# Altium PCB ECG_PCB.PcbDoc
Units mil, origin at the board's own origin, x right, y up, seen from the top; angles counter-clockwise.
Board outline 1724.99 x 1811.5 mil, 4 copper layers (Top Layer, GND, Layer 2, Bottom Layer), stack 23.756 mil thick; 69 components, 50 nets, 267 pads, 156 vias.
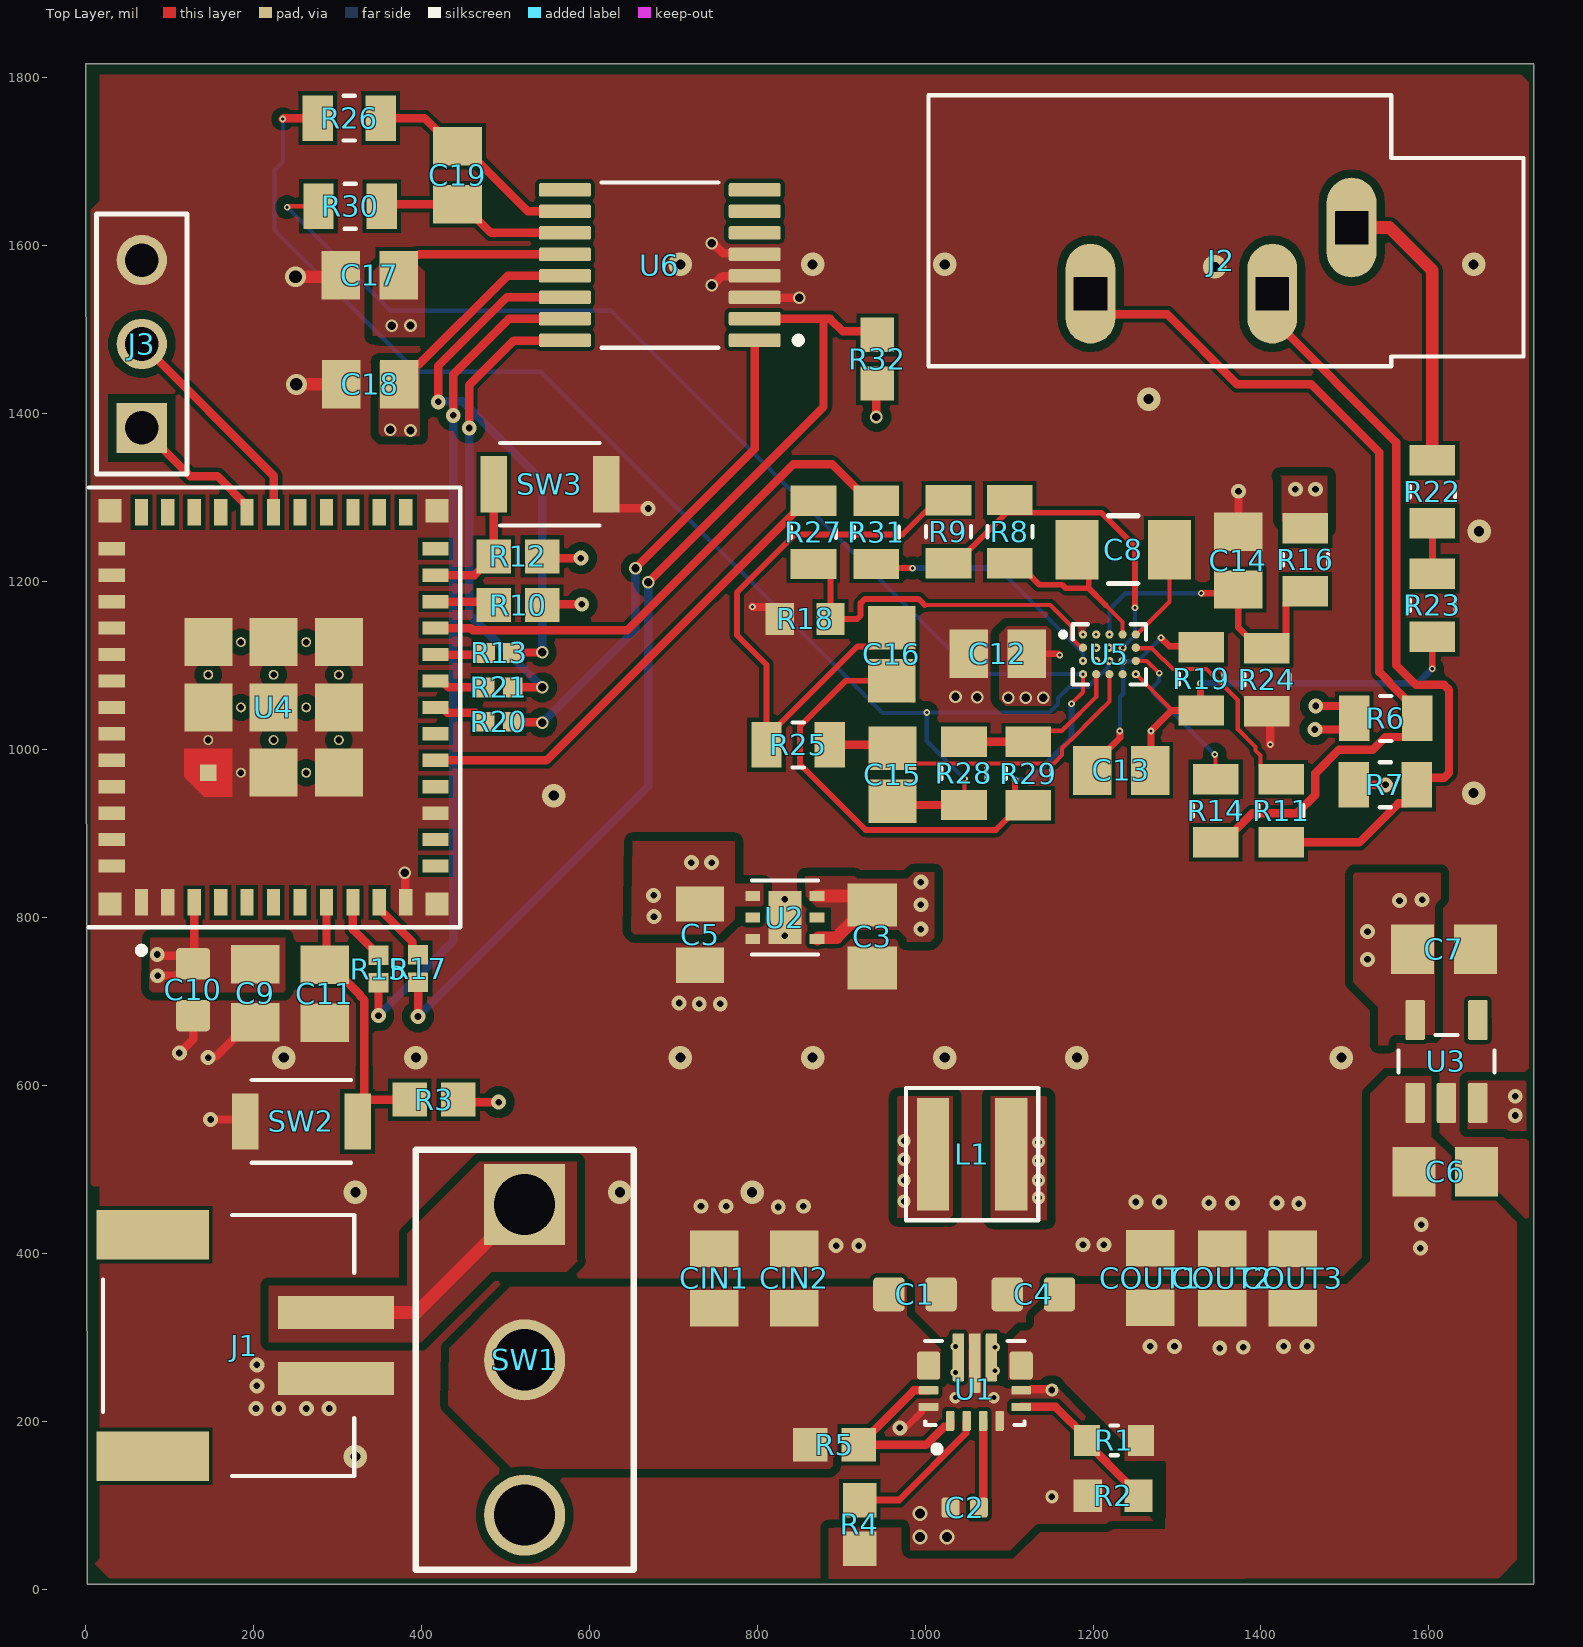
[diagram p0: Top Layer view]
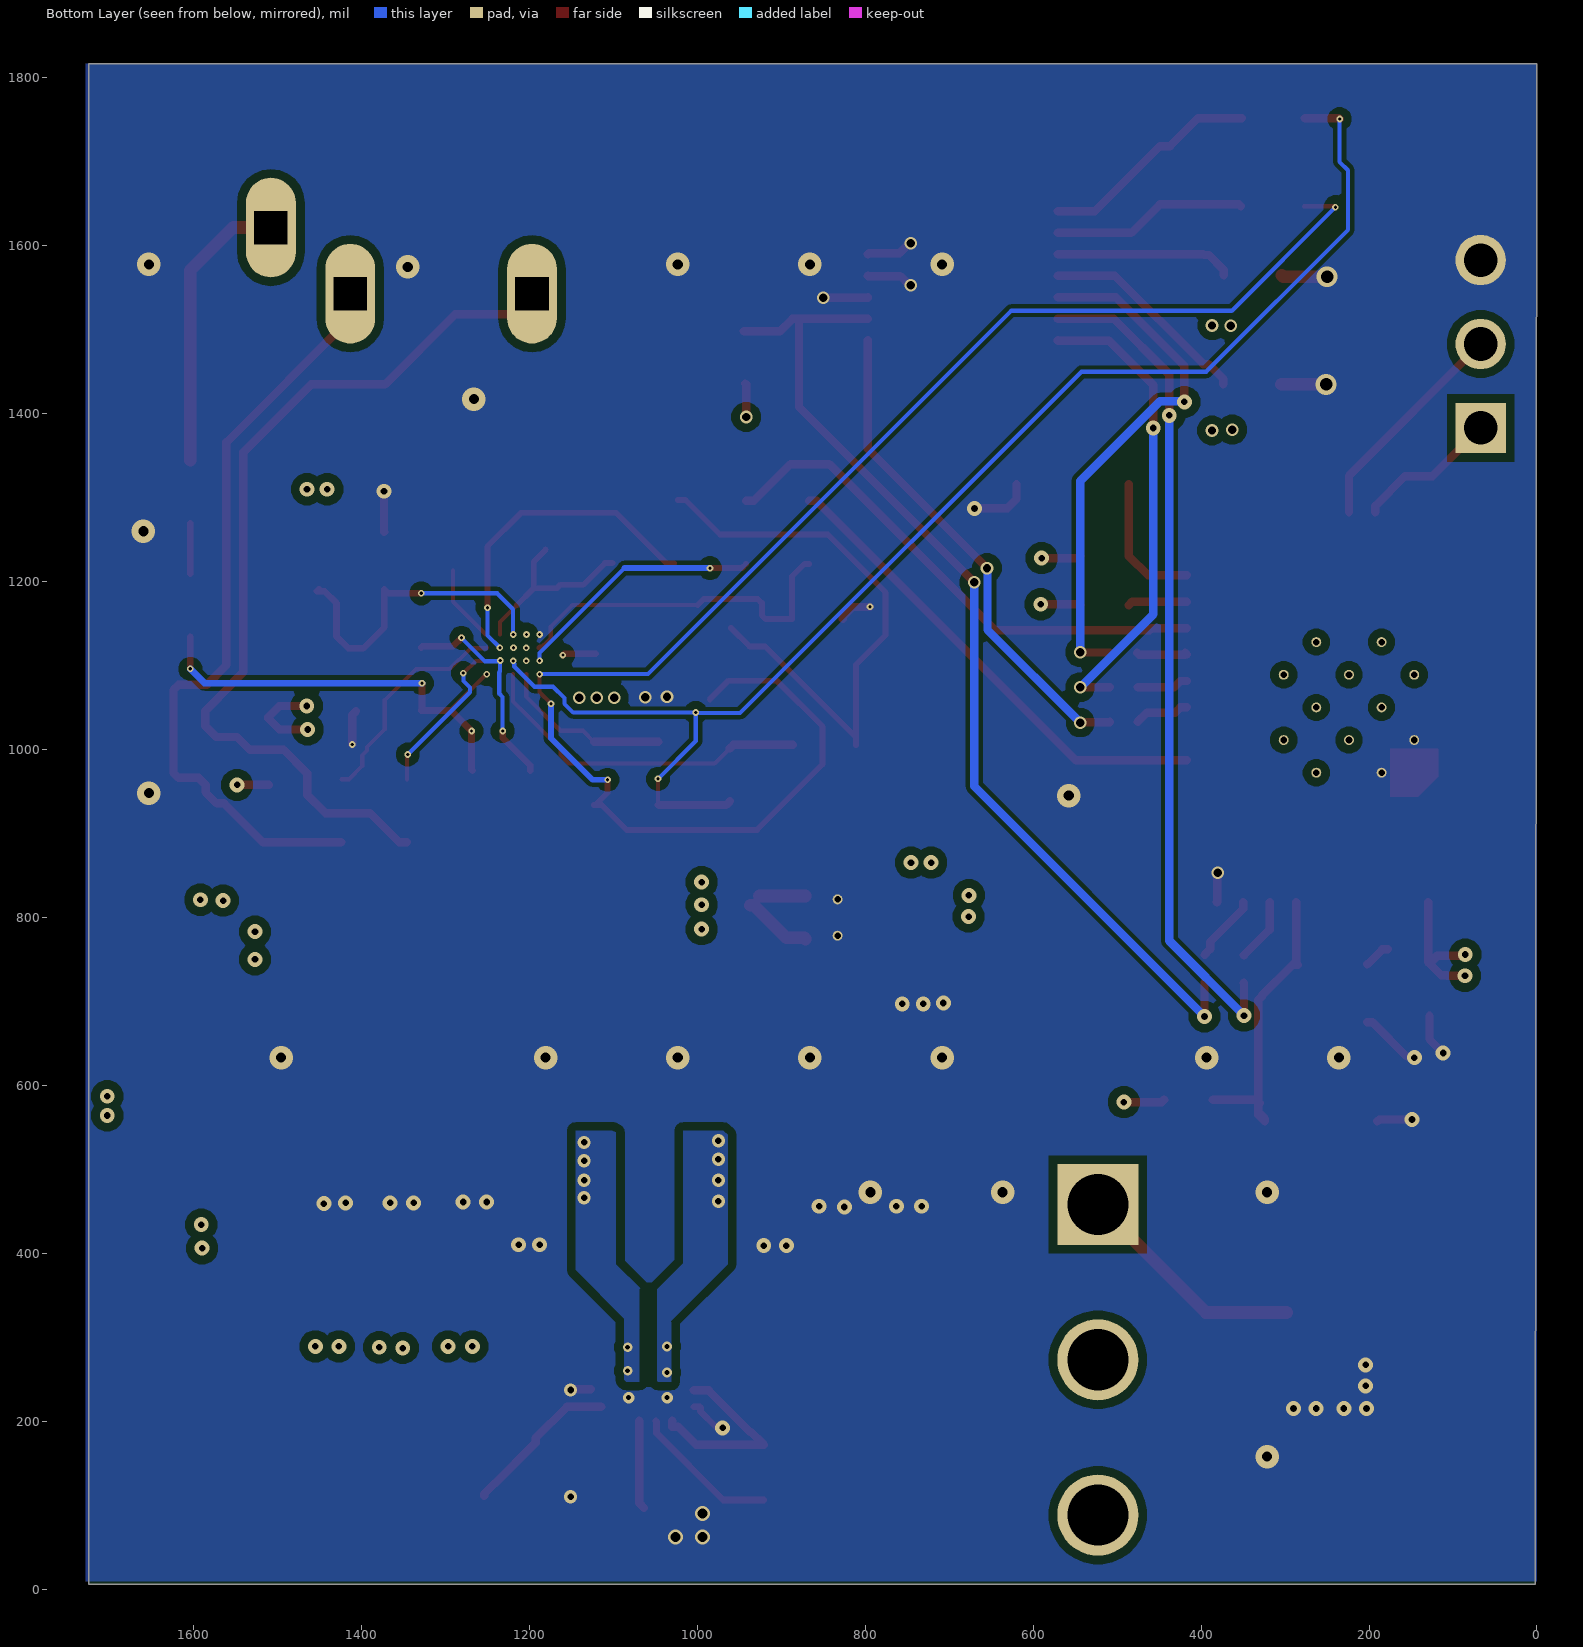
[diagram p1: Bottom Layer view, seen from below]
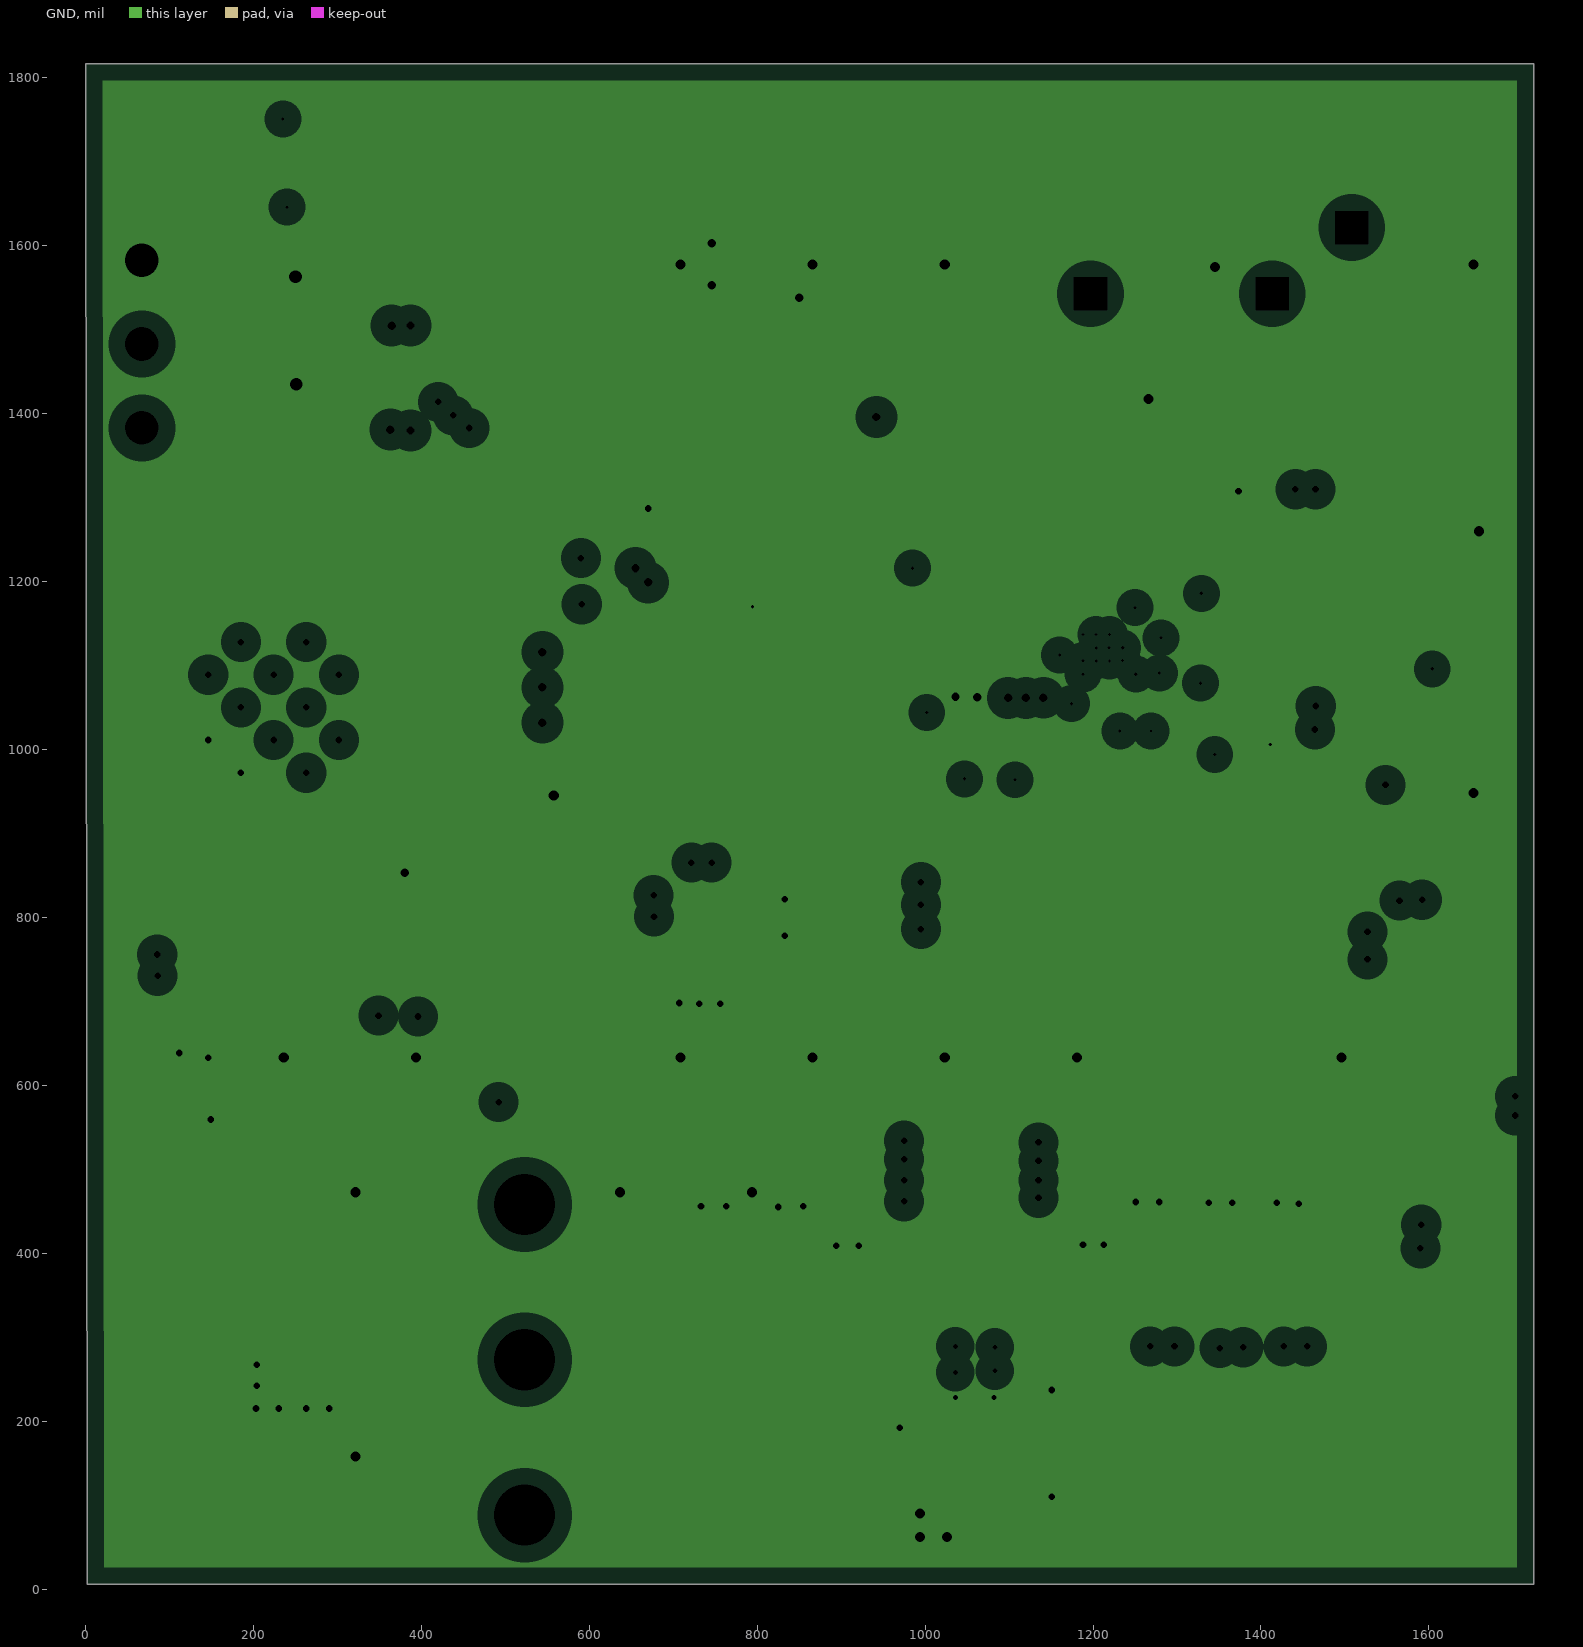
[diagram p2: GND, clearances drawn from the general rule]
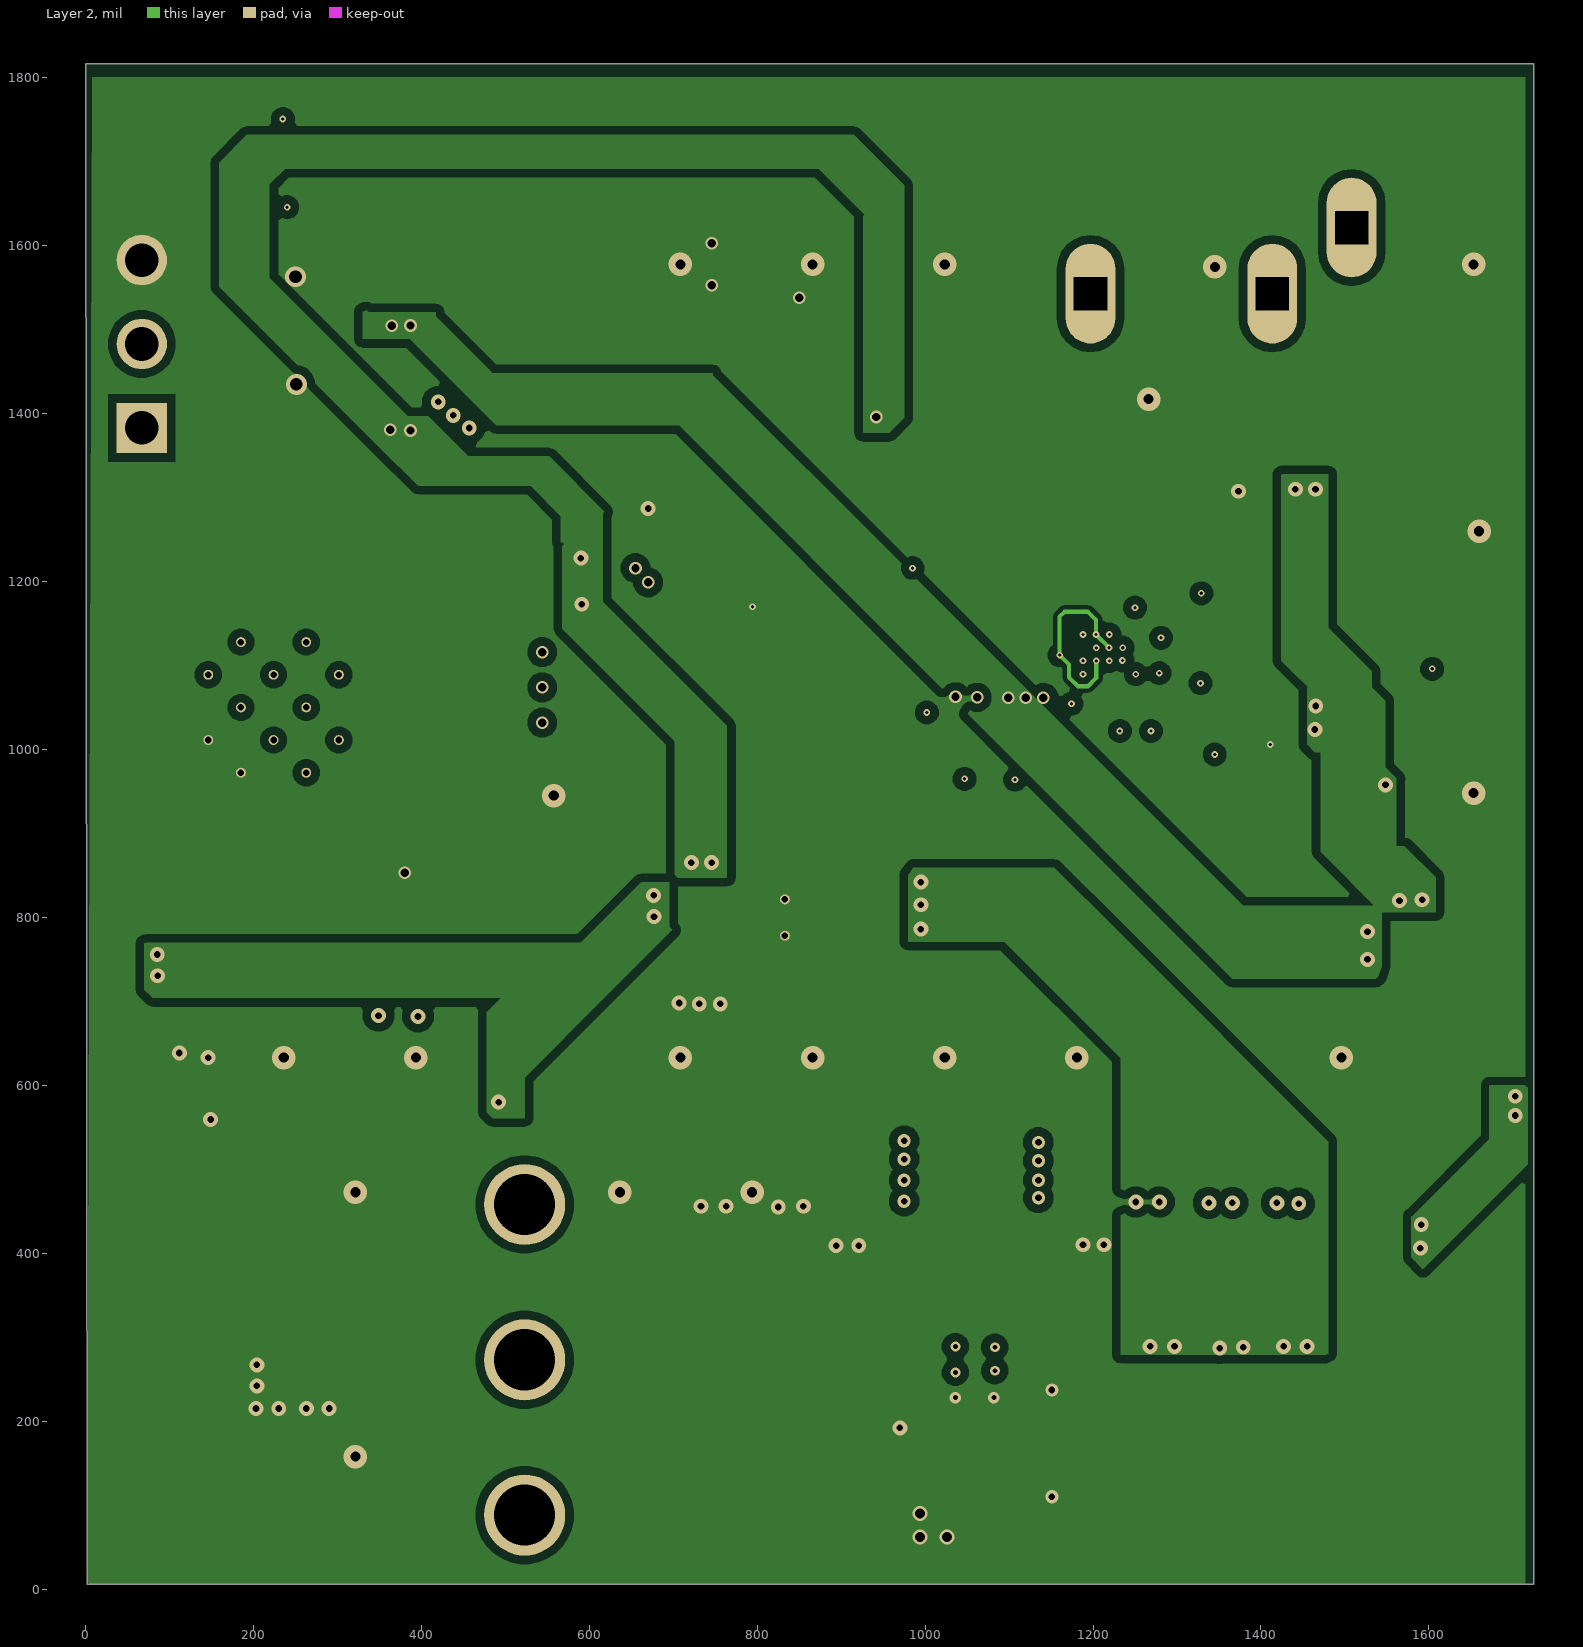
[diagram p3: Layer 2]
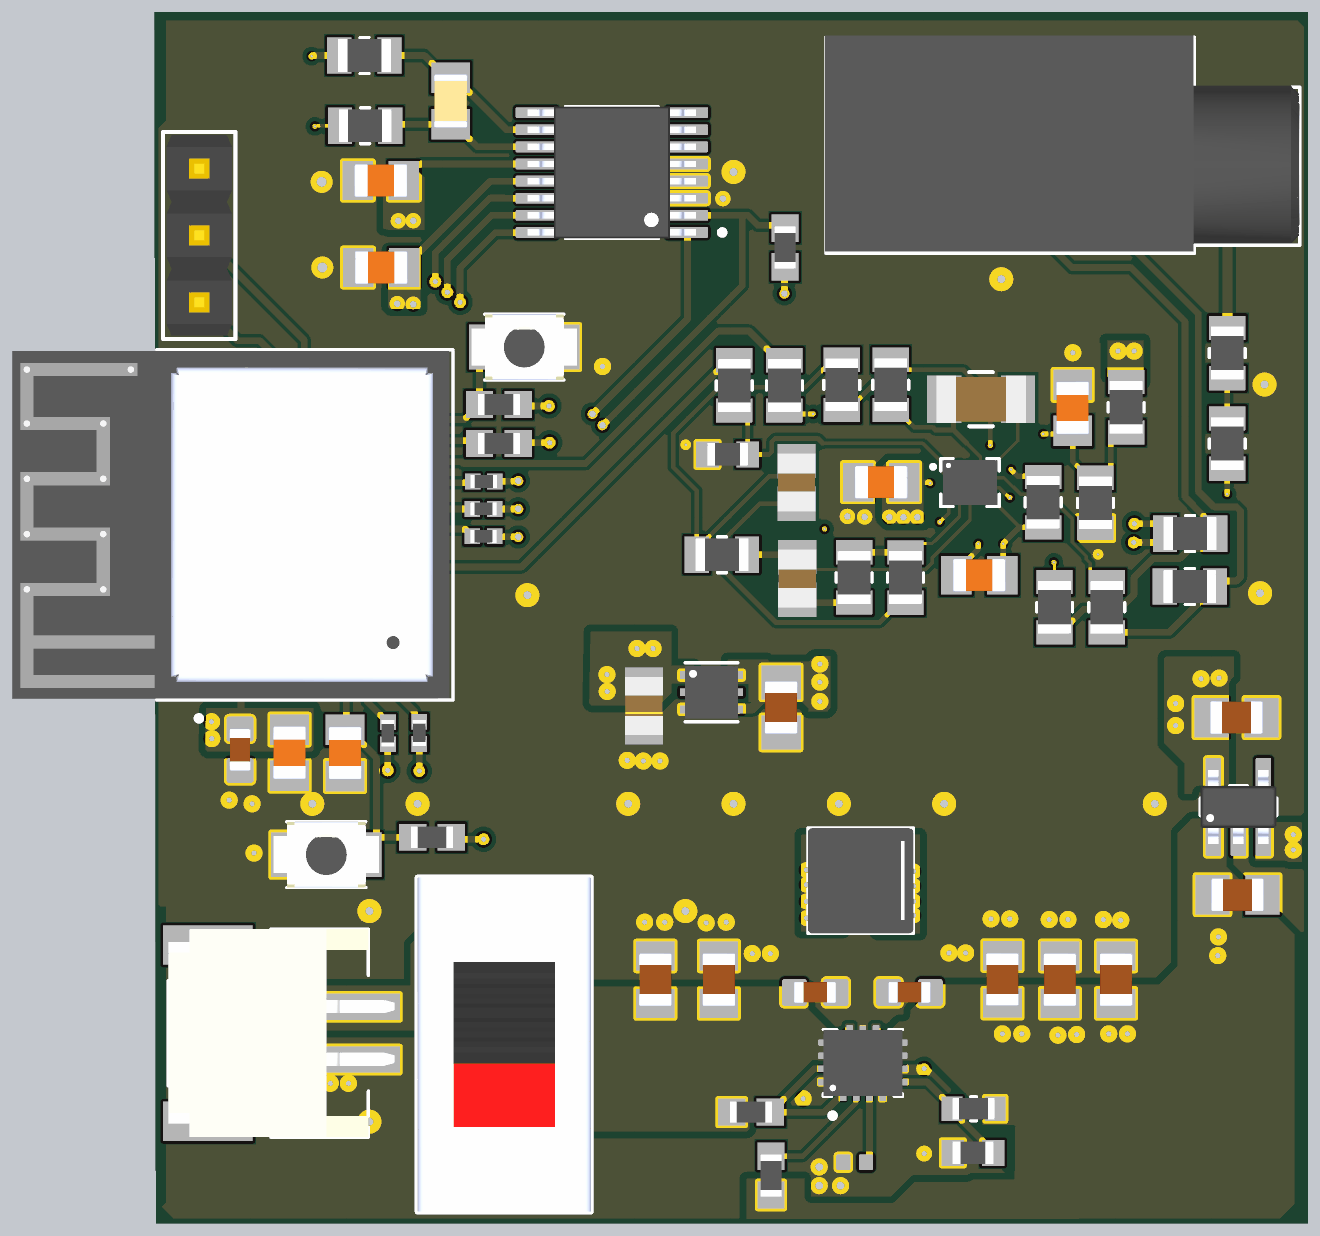
[diagram p4: 3D render of the assembled board from above, using the file's embedded part models]

## Layer stack, top to bottom
Top Solder: solder mask 0.4, Solder Resist, Dk 3.5
Top Layer: signal copper 1.4
Dielectric 2: prepreg 2.8, PP-006, Dk 4.1
GND: plane copper 1.378, net GND
Dielectric 1: dielectric 12.6, FR-4, Dk 4.8
Layer 2: signal copper 1.378
Dielectric 3: prepreg 2.8, PP-006, Dk 4.1
Bottom Layer: signal copper 1.4
Bottom Solder: solder mask 0.4, Solder Resist, Dk 3.5

## Board outline
2,5.5 1725,5.5 1725,1817 0.01,1817

## Design rules (kind name [scope] priority, off if disabled: settings)
Clearance [All] p1: gap=5 ignorepadtopadclearanceinfootprint=TRUE except(3: Arc-Via Track-Via; 10: THPad-THPad THPad-Via THPad-Fill THPad-Poly THPad-Region Via-Fill Via-Poly Via-Region Fill-Fill Fill-Poly Fill-Region Poly-Poly Poly-Region Region-Region)
HoleToHoleClearance [All] p1: gap=8 allowstackedmicrovias=TRUE
MinimumSolderMaskSliver [All] p1: minsoldermaskwidth=1
PlaneClearance [All] p1: clearance=20
PlaneConnect [All] p1: planeconnectstyle=Direct reliefexpansion=20 reliefentries=4 reliefconductorwidth=10 reliefairgap=10
PolygonConnect [All] p1: connectstyle=Direct reliefconductorwidth=10 reliefentries=4 polygonreliefangle="90 Angle" airgapwidth=10
RoutingVias [All] p1: holewidth=28 width=50 viastyle="Through Hole" minholewidth=3.94 minwidth=5.91 maxholewidth=28 maxwidth=50
SilkToSolderMaskClearance [IsPad] p1: minsilkscreentomaskgap=4 clearancetoexposedcopper=TRUE
SolderMaskExpansion [All] p1: expansion=4 istentingtop=FALSE
SupplyNets "Schematic Supply Nets" [InNet('GND')] p1: voltage=0.000
Width [All] p1: maxlimit=50 minlimit=4 preferedwidth=10 toplayer_minwidth=5 bottomlayer_minwidth=5 minimp=50.000000 maximp=50.000000 favimp=50.000000
25 further rules are at their usual default settings.

## Classes and differential pairs
component class ECG_Signal: C8 C9 C10 C11 C12 C13 C14 C15 C16 C17 C18 C19 J2 J3 R3 R6 R7 R8 R9 R10 R11 R12 R13 R14 R15 R16 R17 R18 R19 R20 R21 R22 R23 R24 R25 R26 R27 R28 R29 R30 R31 R32 SW2 SW3 U4 U5 U6
component class ECG_PCB_Power: C1 C2 C3 C4 C5 C6 C7 CIN1 CIN2 COUT1 COUT2 COUT3 J1 L1 R1 R2 R4 R5 SW1 U1 U2 U3

## Components (designator, comment, footprint, x,y, rotation, side; value= is the part's Value field where it differs from the comment)
C1 "10uF 0603" CAPC1608X100N 987.9,351 r180 top
C2 "0.1uF 0402" CAPC1005X55N 1047.07,97 r0 top
C3 "10uF 16V" CAPC2012X135N 937,777.1 r90 top
C4 "10uF 0603" CAPC1608X100N 1129,351 r0 top
C5 "22UF 10V X5R" CAP_GRM21B_MUR 732,779.5 r90 top
C6 "4.7uF" CAPC2012X135N 1619.6,497 r0 top
C7 "4.7uF" CAPC2012X135N 1618,762 r0 top
C8 "3.3uF 1206" CAPC340180_180N_KEM 1236,1238 r180 top
C9 "100nF 0805" CAPC2012X88N 202,709.55 r90 top
C10 "10uF 0603" CAPC1608X100N 128,713.9 r270 top
C11 "1 uF 0805" CAPC2012X88N 285,709 r270 top
C12 "100nF 0805" CAPC2012X88N 1086.55,1114 r180 top
C13 "1nF 0805" CAPC2012X88N 1233.55,975 r180 top
C14 "100nF 0805" CAPC2012X88N 1373,1225 r90 top
C15 "5.6 nF" CAPC220145_88N_KEM 961.25,969.87 r90 top
C16 "5.6 nF" CAPC220145_88N_KEM 960.25,1113.48 r270 top
C17 "100nF 0805" CAPC2012X88N 338.55,1565.1 r0 top
C18 "100nF 0805" CAPC2012X88N 339,1435 r0 top
C19 "10 nF 0805" CAPC2012X140N 443,1684 r270 top
CIN1 "10uF 0805" CAPC2012X145N 749,370 r270 top
CIN2 "10uF 0805" CAPC2012X145N 844,370 r270 top
COUT1 "22uF 0805" CAPC2012X145N 1268,370.43 r270 top
COUT2 "22uF 0805" CAPC2012X145N 1354,370 r270 top
COUT3 "22uF 0805" CAPC2012X145N 1438,370 r270 top
J1 "BAT" JST_S2B-PH-SM4-TB 190,290 r270 top
J2 "SJ1-3533NG" CUI_SJ1-3533NG 1508.02,1621.74 r180 top
J3 "UART" CONN_PH1-03-UA_ADM 67,1383 r90 top
L1 "1.5 uH" IND_XFL4020-152MEC 1056,518 r180 top
R1 "390kohm 0603" RESC1608X55N 1225,177 r0 top
R2 "100 kohm 0603" RESC1508X50N 1224,111 r0 top
R3 "10k 0603" RESC1607X60N 415,583 r180 top
R4 "100 kOhms 0603 A" RESC1607X60N 922,77 r90 top
R5 "10k 0603" RESC1607X60N 892.06,172 r0 top
R6 "10M" RESC2012X60N 1548.63,1037 r180 top
R7 "10M" RESC2012X60N 1548.23,958 r180 top
R8 "10M" RESC2012X60N 1101,1259.6 r90 top
R9 "499k" RESC2012X60N 1027.78,1259.48 r90 top
R10 "10k 0603" RESC1607X60N 515.06,1172 r0 top
R11 "180k" RESC2012X60N 1424,927 r90 top
R12 "10k 0603" RESC1607X60N 515,1230 r0 top
R13 "47ohm" RESC1005X35N 492.46,1115 r0 top
R14 "180k" RESC2012X60N 1346,927 r90 top
R15 "47ohm" RESC1005X35N 349,738.46 r90 top
R16 "10M" RESC2012X60N 1453,1226 r90 top
R17 "47ohm" RESC1005X35N 396,739 r90 top
R18 "100 kohm 0603" RESC1508X50N 857.13,1155.48 r0 top
R19 "10M" RESC2012X60N 1329,1084 r90 top
R20 "47ohm" RESC1005X35N 492,1033 r180 top
R21 "47ohm" RESC1005X35N 492,1074 r180 top
R22 "180k" RESC2012X60N 1604.25,1307.08 r270 top
R23 "180k" RESC2012X60N 1604.25,1171.68 r270 top
R24 "10M" RESC2012X60N 1407,1083 r90 top
R25 "1M" RESC2012X60N 848.65,1005.48 r0 top
R26 "1k" RESC2012X60N 314,1752 r180 top
R27 "1k" RESC2012X60N 867,1258.6 r90 top
R28 "1M" RESC2012X60N 1046.25,971.48 r270 top
R29 "1M" RESC2012X60N 1123,971.4 r90 top
R30 "1k" RESC2012X60N 315,1647 r0 top
R31 "1k" RESC2012X60N 942,1258.6 r90 top
R32 "10k 0603" RESC1607X60N 943,1464.94 r90 top
SW1 "Slide switch" SW_1101M2S3CQE2 523,273.04 r0 top
SW2 "Button" SW_B3U-1000P 257,557 r0 top
SW3 "Button" SW_B3U-1000P 553,1316 r0 top
U1 "Buck-Boost" VREG_TPS63070RNMR 1059.32,245.49 r90 top locked
U2 "Digital LDO" VREG_TLV75733PDRVR 833,799.85 r0 top
U3 "Analog LDO" SOT95P280X145-5N 1621,628.41 r90 top
U4 "MCU" MODULE_ESP32-H2-MINI-1-H2 117.6,1050.12 r90 top
U5 "AD8233ACBZ-R7" BGA20N40P5X4_204X170X56N 1219.5,1113.38 r0 top locked
U6 "ADC" SOP65P640X120-16N 684,1577 r180 top

## Footprints (in the part's own frame and the unit in brackets; to place one, negate y for a bottom-side part, rotate by r counter-clockwise, add the part's x,y. Pads: shape width x height; smd on the part's side, far side on the other; paste and mask are expansions set on the pad)
BGA20N40P5X4_204X170X56N [mm]
  round 0.25 smd mask+0.102: A1(-0.8,0.6) A2(-0.4,0.6) A3(0,0.6) A4(0.4,0.6) A5(0.8,0.6) B1(-0.8,0.2) B2(-0.4,0.2) B3(0,0.2) B4(0.4,0.2) B5(0.8,0.2) C1(-0.8,-0.2) C2(-0.4,-0.2) C3(0,-0.2) C4(0.4,-0.2) C5(0.8,-0.2) D1(-0.8,-0.6) D2(-0.4,-0.6) D3(0,-0.6) D4(0.4,-0.6) D5(0.8,-0.6)
  silkscreen extent -1.45,-0.91 1.11,0.91, body extent -1.02,-0.85 1.02,0.85, height 0.56
CAP_GRM21B_MUR [mil]
  rect 42x57 smd paste+0 mask+0: 1(-36.5,0) 2(36.5,0)
  body extent -44,-29 44,29, height 57
CAPC1005X55N [mm]
  rrect25% 0.54x0.6 smd paste+0 mask+0.102: 1(-0.43,0) 2(0.43,0)
CAPC1608X100N [mm]
  rrect25% 0.95x1.03 smd paste+0 mask+0.102: 1(-0.79,0) 2(0.79,0)
  body extent -0.8,-0.4 0.8,0.4, height 1
CAPC2012X88N [mm]
  rect 1.16x1.47 smd: 1(-0.875,0) 2(0.875,0)
  body extent -1,-0.63 1,0.63, height 0.88
CAPC2012X135N [mm]
  rect 1.3x1.5 smd mask+0.102: 1(-0.95,0)
  rect 1.3x1.5 smd: 2(0.95,0)
  body extent -1,-0.63 1,0.63, height 1.4
CAPC2012X140N [mm]
  rect 1.16x1.47 smd: 1(-0.88,0) 2(0.88,0)
  body extent -1.02,-0.64 1.02,0.64, height 1.4
CAPC2012X145N [mm]
  rect 1.11x1.47 smd: 1(-0.9,0) 2(0.9,0)
  body extent -1,-0.63 1,0.63, height 1.45
CAPC220145_88N_KEM [mm]
  rect 1.306x1.45 smd paste+0 mask+0: 1(-0.803,0) 2(0.803,0)
  body extent -1.1,-0.72 1.1,0.72, height 0.88
CAPC340180_180N_KEM [mm]
  rect 1.306x1.8 smd paste+0 mask+0: 1(-1.403,0) 2(1.403,0)
  silkscreen extent -0.44,-1.03 0.44,1.03, body extent -1.7,-0.9 1.7,0.9, height 1.8
CONN_PH1-03-UA_ADM [mil]
  rect 60x60 hole 40 paste-99999 mask+0: 1(0,0)
  round 60 hole 40 paste-99999 mask+0: 2(100,0) 3(200,0)
  silkscreen extent -55,-54 255,54, body extent -50,-49 250,49, height 335
CUI_SJ1-3533NG [mm]
  oval 1.508x3.016 hole 1 square: 1(0,0) 2(2.4,2) 3(7.9,2)
  silkscreen extent -5.2,-4 12.8,4.2, body extent -5.22,-4.06 12.84,4.14, height 11.9
IND_XFL4020-152MEC [mm]
  rect 0.98x3.4 smd: 1(-1.185,0) 2(1.185,0)
  silkscreen extent -2,-2 2,2, body extent -2,-2 2,2, height 2.1
JST_S2B-PH-SM4-TB [mm]
  rect 1x3.5 smd paste+0 mask+0.102: 1(-1,2.75) 2(1,2.75)
  rect 1.5x3.4 smd paste+0 mask+0.102: T1(-3.35,-2.8) T2(3.35,-2.8)
  silkscreen extent -3.95,-4.3 3.95,3.3, body extent -3.96,-4.3 3.94,4.3, height 5.5
MODULE_ESP32-H2-MINI-1-H2 [mm]
  rect 0.8x0.4 smd: 1(-5.9,1.3) 2(-5.9,0.5) 3(-5.9,-0.3) 4(-5.9,-1.1) 5(-5.9,-1.9) 6(-5.9,-2.7) 7(-5.9,-3.5) 8(-5.9,-4.3) 9(-5.9,-5.1) 10(-5.9,-5.9) 11(-5.9,-6.7) 25(5.9,-6.7) 26(5.9,-5.9) 27(5.9,-5.1) 28(5.9,-4.3) 29(5.9,-3.5) 30(5.9,-2.7) 31(5.9,-1.9) 32(5.9,-1.1) 33(5.9,-0.3) 34(5.9,0.5) 35(5.9,1.3)
  rect 0.4x0.8 smd: 12(-4.8,-7.6) 13(-4,-7.6) 14(-3.2,-7.6) 15(-2.4,-7.6) 16(-1.6,-7.6) 17(-0.8,-7.6) 18(0,-7.6) 19(0.8,-7.6) 20(1.6,-7.6) 21(2.4,-7.6) 22(3.2,-7.6) 23(4,-7.6) 24(4.8,-7.6) 36(4.8,2.2) 37(4,2.2) 38(3.2,2.2) 39(2.4,2.2) 40(1.6,2.2) 41(0.8,2.2) 42(0,2.2) 43(-0.8,2.2) 44(-1.6,2.2) 45(-2.4,2.2) 46(-3.2,2.2) 47(-4,2.2) 48(-4.8,2.2)
  rect 1.45x1.45 smd: 49_1(0,-2.7) 49_3(0,-0.725) 49_4(1.975,-0.725) 49_5(-1.975,-2.7) 49_6(1.975,-2.7) 49_7(-1.975,-4.675) 49_8(0,-4.675) 49_9(1.975,-4.675)
  rect 0.5x0.5 smd paste-1 mask+0: 49_2(-1.975,-0.725)
  rect 0.7x0.7 smd: 50(5.95,2.25) 51(5.95,-7.65) 52(-5.95,-7.65) 53(-5.95,2.25)
  round 0.3 hole 0.2 mask+0: 54(-0.988,-0.725) 55(0.988,-0.725) 56(-1.975,-1.713) 57(0,-1.713) 58(1.975,-1.713) 59(-0.988,-2.7) 60(0.988,-2.7) 61(-1.975,-3.688) 62(0,-3.688) 63(1.975,-3.688) 64(-0.988,-4.675) 65(0.988,-4.675)
  Top Layer region: -1.25,-1.45 -2.7,-1.45 -2.7,-0.6 -2.1,0 -1.25,0
  silkscreen extent -7.45,-8.35 6.65,2.9, body extent -6.6,-8.22 6.6,8.38, height 2.55
RESC1005X35N [mm]
  rect 0.59x0.6 smd paste+0 mask+0.102: 1(-0.42,0) 2(0.42,0)
  body extent -0.5,-0.25 0.5,0.25, height 0.4
RESC1508X50N [mm]
  rect 0.86x0.98 smd: 1(-0.765,0) 2(0.765,0)
  body extent -0.77,-0.43 0.77,0.43, height 0.55
RESC1607X60N [mm]
  rect 1.04x1.02 smd: 1(-0.735,0) 2(0.735,0)
  body extent -0.8,-0.4 0.8,0.4, height 0.55
RESC1608X55N [mm]
  rect 0.79x0.93 smd paste+0 mask+0.102: 1(-0.82,0) 2(0.82,0)
  silkscreen extent -0.11,-0.45 0.11,0.45, body extent -0.8,-0.4 0.8,0.4, height 0.55
RESC2012X60N [mm]
  rect 0.92x1.38 smd paste+0 mask+0.102: 1(-0.955,0) 2(0.955,0)
  silkscreen extent -0.17,-0.68 0.17,0.68, body extent -1,-0.63 1,0.63, height 0.6
SOP65P640X120-16N [mm]
  rrect25% 1.57x0.41 smd: 1(-2.87,2.275) 2(-2.87,1.625) 3(-2.87,0.975) 4(-2.87,0.325) 5(-2.87,-0.325) 6(-2.87,-0.975) 7(-2.87,-1.625) 8(-2.87,-2.275) 9(2.87,-2.275) 10(2.87,-1.625) 11(2.87,-0.975) 12(2.87,-0.325) 13(2.87,0.325) 14(2.87,0.975) 15(2.87,1.625) 16(2.87,2.275)
  silkscreen extent -4.29,-2.5 1.77,2.5, body extent -3.2,-2.5 3.2,2.5, height 1.2
SOT95P280X145-5N [mm]
  rrect15% 1.21x0.59 smd: 1(-1.255,0.95) 2(-1.255,0) 3(-1.255,-0.95) 4(1.255,-0.95) 5(1.255,0.95)
  silkscreen extent -0.33,-1.45 0.8,1.45, body extent -1.4,-1.45 1.4,1.45, height 1.45
SW_1101M2S3CQE2 [mm]
  rect 2.45x2.45 / inner round 2.45 / far side rect 2.45x2.45 hole 1.85: 1(0,4.7)
  round 2.45 hole 1.85: 2(0,0) 3(0,-4.7)
  silkscreen extent -3.3,-6.35 3.3,6.35, body extent -3.3,-6.35 3.3,6.35, height 13.33
SW_B3U-1000P [mm]
  rect 0.8x1.7 smd: 1(-1.7,0) 2(1.7,0)
  silkscreen extent -1.5,-1.25 1.5,1.25, body extent -2,-1.25 2,1.25, height 1.75
VREG_TLV75733PDRVR [mm]
  rrect5% 0.45x0.3 smd: 1(-0.975,0.65) 2(-0.975,0) 3(-0.975,-0.65) 4(0.975,-0.65) 5(0.975,0) 6(0.975,0.65)
  rect 1x1.6 smd paste-2: 7(0,0)
  round 0.3 hole 0.2 mask+0: 8(0,0.55) 9(0,-0.55)
  silkscreen extent -1,-1.12 1,1.12, body extent -1,-1 1,1, height 0.8
VREG_TPS63070RNMR [mm]
  rrect25% 0.6x0.25 smd paste+0 mask+0: 1(-1.15,0.75) 2(-1.15,0.25) 3(-1.15,-0.25) 4(-1.15,-0.75)
  rrect25% 0.25x0.6 smd paste+0 mask+0: 5(-0.725,-1.4) 6(-0.225,-1.4) 14(-0.225,1.4) 15(-0.725,1.4)
  rrect25% 0.85x0.7 smd paste-1 mask+0: 7_8(0.525,-1.4) 12_13(0.525,1.4)
  rrect25% 1.45x0.35 smd paste-2 mask+0: 9(0.775,-0.5) 11(0.775,0.5)
  rrect25% 1.8x0.35 smd paste-2 mask+0: 10(0.6,0)
  silkscreen extent -2.1,-1.5 1.27,1.5, body extent -1.25,-1.5 1.25,1.5, height 1

## Part data
C1 C4 C10: library part MSAST168BB5106MTNA01, "10uF 25V 20% Multilayer Ceramic Capacitor X5R 0603 (1608 Metric)", MANUFACTURER="Taiyo Yuden", MAXIMUM_PACKAGE_HEIGHT=1.00mm, Package="1608-2 TAIYO", DATASHEET_URL=https://snapeda.s3.amazonaws.com/datasheet/Taiyo_Yuden_MLCC_S.pdf, MPN=MSAST168BB5106MTNA01, SOURCE_URL=https://www.snapeda.com/parts/MSAST168BB5106MTNA01/Taiyo+Yuden/view-part/, STANDARD=IPC-7351B
C2: library part MSAST105SB7104MFNB25, "CAP CER 0.1UF 25V X7R 0402", MANUFACTURER="Taiyo Yuden", MAXIMUM_PACKAGE_HEIGHT=0.55mm, MPN=MSAST105SB7104MFNB25, STANDARD=IPC-7351B
C3: library part GRM21BR61C106KE15L, "10 ÂµF Â±10% 16V Ceramic Capacitor X5R 0805 (2012 Metric)", Package="805-2 Murata", Check_prices=https://www.snapeda.com/parts/GRM21BR61C106KE15L/Murata/view-part/?ref=eda, MF=Murata, MP=GRM21BR61C106KE15L, SnapEDA_Link=https://www.snapeda.com/parts/GRM21BR61C106KE15L/Murata/view-part/?ref=snap
C5: library part GRM21BR61A226ME44L, "CAP CER 22UF 10V X5R 0805", Manufacturer_Name=Murata, Copyright="Copyright (C) 2026 Ultra Librarian. All rights reserved.", Manufacturer_Part_Number=GRM21BR61A226ME44L, Type="Ceramic Capacitors"
C6 C7: library part GRM21BR71A475KA73L, "SMD Capacitor X7R(EIA) with Capacitance: 4.7uF Tol. 10%. Rated Voltage: 10Vdc", Package="2012 Murata", Check_prices=https://www.snapeda.com/parts/GRM21BR71A475KA73L/Murata/view-part/?ref=eda, MF=Murata, MP=GRM21BR71A475KA73L, SnapEDA_Link=https://www.snapeda.com/parts/GRM21BR71A475KA73L/Murata/view-part/?ref=snap
C8: library part C1206C335K3RACTU, "SMD Comm X7R, Ceramic, 3.3 uF, 10%, 25 VDC, X7R, SMD, MLCC, Temperature Stable, Class II, 1206", Manufacturer_Name=Kemet, Copyright="Copyright (C) 2026 Ultra Librarian. All rights reserved.", Datasheet=https://content.kemet.com/datasheets/KEM_C1002_X7R_SMD.pdf, Manufacturer_Part_Number=C1206C335K3RACTU
C9 C12 C14 C17 C18: library part C0805C104K5RACTU, "Capacitor, Ceramic, Cap, .100uF, Tol 10%, SMT, 50V, X7R, Tape/Reel", Package=Package, Check_prices=https://www.snapeda.com/parts/C0805C104K5RACTU/KEMET/view-part/?ref=eda, MF=KEMET, MP=C0805C104K5RACTU, SnapEDA_Link=https://www.snapeda.com/parts/C0805C104K5RACTU/KEMET/view-part/?ref=snap
C11: library part C0805C105K4RACTU, "Capacitor,Ceramic,Cap 1 uF,Tol 10%,Vol-Rtg 16 VDC,SMT,0805,X7R,Tape & Reel", Package="805-2 KEMET", Check_prices=https://www.snapeda.com/parts/C0805C105K4RACTU/KEMET/view-part/?ref=eda, MF=KEMET, MP=C0805C105K4RACTU, SnapEDA_Link=https://www.snapeda.com/parts/C0805C105K4RACTU/KEMET/view-part/?ref=snap
C13: library part C0805C102J5GACTU, "CAP, 1000PF, 50V, 5%, C0G/NP0, 0805; Capacitance:1000pF; Voltage Rating:50V; Ceramic Capacitor Case:0805 [2012 Metric]; Capacitance Tolerance:Â± 5%; Dielectric Characteristic:C0G / NP0; Product Range:C Series KEMET; Opera", Package=Package, Check_prices=https://www.snapeda.com/parts/C0805C102J5GAC-TU/Kemet/view-part/?ref=eda, MF=KEMET, MP=C0805C102J5GAC-TU, SnapEDA_Link=https://www.snapeda.com/parts/C0805C102J5GAC-TU/Kemet/view-part/?ref=snap
C15 C16: library part C0805C562J5GACTU, "SMD Comm C0G, Ceramic, 5600 pF, 5%, 50 VDC, C0G, SMD, MLCC, Ultra-Stable, Low Loss, Class I, 0805", Manufacturer_Name=Kemet, Copyright="Copyright (C) 2025 Ultra Librarian. All rights reserved.", Manufacturer_Part_Number=C0805C562J5GACTU
C19: library part C0805C103J5GACTU, "0805 C 10nF Ceramic Multilayer Capacitor, 50 V, +125degC, C0G Dielectric, +/-5%", Package="0805 Kemet", Check_prices=https://www.snapeda.com/parts/C0805C103J5GACTU/KEMET/view-part/?ref=eda, MF=KEMET, MP=C0805C103J5GACTU, SnapEDA_Link=https://www.snapeda.com/parts/C0805C103J5GACTU/KEMET/view-part/?ref=snap
CIN1 CIN2: library part GRM21BC71E106ME11L, "0805 10 uF 25 V Â±20% Tolerance X7S Multilayer Ceramic Capacitor", Package="2012 Murata", Check_prices=https://www.snapeda.com/parts/GRM21BC71E106ME11L/Murata/view-part/?ref=eda, MF=Murata, MP=GRM21BC71E106ME11L, SnapEDA_Link=https://www.snapeda.com/parts/GRM21BC71E106ME11L/Murata/view-part/?ref=snap
COUT1 COUT2 COUT3: library part GRM21BC81C226ME44L, "0805 22 uF 16 V Â±20% Tolerance X6S Multilayer Ceramic Chip Capacitor", Package="2012 Murata", Check_prices=https://www.snapeda.com/parts/GRM21BC81C226ME44L/Murata+Electronics+North+America/view-part/?ref=eda, MF="Murata Electronics", MP=GRM21BC81C226ME44L, SnapEDA_Link=https://www.snapeda.com/parts/GRM21BC81C226ME44L/Murata+Electronics+North+America/view-part/?ref=snap
J1: library part S2B-PH-SM4-TB, MANUFACTURER="JST Sales", MAXIMUM_PACKAGE_HEIGHT=5.5mm, MPN=S2B-PH-SM4-TB, STANDARD="Manufacturer Recommendations", UNIT=MM
J2: "3.5 mm Right-Angle Stereo Jack, 3 Pin PCB Mount, Isolated Ground", Package=None, Check_prices=https://www.snapeda.com/parts/SJ1-3533NG/Same+Sky/view-part/?ref=eda, MF="Same Sky", MP=SJ1-3533NG, SnapEDA_Link=https://www.snapeda.com/parts/SJ1-3533NG/Same+Sky/view-part/?ref=snap
J3: library part PH1-03-UA, "Description", Manufacturer_Name="ADAM TECHNOLOGIES INC", Copyright="Copyright (C) 2025 Ultra Librarian. All rights reserved.", Manufacturer_Part_Number=PH1-03-UA, RefDes=RefDes, Type=Type
L1: library part XFL4020-152MEC, "Inductor Power Shielded Wirewound 1.5uH 20% 100KHz 9.1A 15.8mOhm DCR 1515 Automotive Embossed Plastic T/R", Package=None, Check_prices=https://www.snapeda.com/parts/XFL4020-152MEC/Coilcraft/view-part/?ref=eda, MF=Coilcraft, MP=XFL4020-152MEC, SnapEDA_Link=https://www.snapeda.com/parts/XFL4020-152MEC/Coilcraft/view-part/?ref=snap
R1: library part RT0603BRD07390KL, "390 kOhms Â±0.1% 0.1W, 1/10W Chip Resistor 0603 (1608 Metric) Thin Film", MANUFACTURER=Yageo, Package="1608 Yageo", DATASHEET_URL=https://s3.amazonaws.com/snapeda/datasheet/RT0603BRD07390KL_Yageo.pdf, MPN=RT0603BRD07390KL, SOURCE_URL=https://www.snapeda.com/parts/RT0603BRD07390KL/Yageo/view-part/
R2 R18: library part CRCW0603100KFKEA, "Resistor, Thick Film, 100 Kilohms, 0.1W, 1%, SMT, TCR 37 ppm/DegC, Tape and Reel", Package="1508 Vishay", Check_prices=https://www.snapeda.com/parts/CRCW0603100KFKEA/Vishay+Dale/view-part/?ref=eda, MF=Vishay, MP=CRCW0603100KFKEA, SnapEDA_Link=https://www.snapeda.com/parts/CRCW0603100KFKEA/Vishay+Dale/view-part/?ref=snap
R3 R5 R10 R12 R32: library part RC0603FR-0710KL, "10 kOhms Â±1% 0.1W, 1/10W Chip Resistor 0603 (1608 Metric) Moisture Resistant Thick Film", Package="0603 Yageo", Check_prices=https://www.snapeda.com/parts/RC0603FR-0710KL/Yageo/view-part/?ref=eda, MF=Yageo, MP=RC0603FR-0710KL, SnapEDA_Link=https://www.snapeda.com/parts/RC0603FR-0710KL/Yageo/view-part/?ref=snap
R4: library part RC0603FR-07100KL, "100 kOhms Â±1% 0.1W, 1/10W Chip Resistor 0603 (1608 Metric) Moisture Resistant Thick Film", Package="0603 Yageo", Check_prices=https://www.snapeda.com/parts/RC0603FR-07100KL/Yageo/view-part/?ref=eda, MF=Yageo, MP=RC0603FR-07100KL, SnapEDA_Link=https://www.snapeda.com/parts/RC0603FR-07100KL/Yageo/view-part/?ref=snap
R6 R7 R8 R16 R19 R24: library part RC0805FR-0710ML, "10 MOhms Â±1% 0.125W, 1/8W Chip Resistor 0805 (2012 Metric) Moisture Resistant Thick Film", Package="2012 Yageo", Check_prices=https://www.snapeda.com/parts/RC0805FR-0710ML/Yageo/view-part/?ref=eda, MF=Yageo, MP=RC0805FR-0710ML, SnapEDA_Link=https://www.snapeda.com/parts/RC0805FR-0710ML/Yageo/view-part/?ref=snap
R9: library part RC0805FR-07499KL, "0805 (2012 mÃ©trico), 499 kOhms Â±1%, 0,125 W, 1/8 W, pelÃ­cula gruesa resistente a la humedad", Package="2012 Yageo", Check_prices=https://www.snapeda.com/parts/RC0805FR-07499KL/Yageo/view-part/?ref=eda, MF=Yageo, MP=RC0805FR-07499KL, SnapEDA_Link=https://www.snapeda.com/parts/RC0805FR-07499KL/Yageo/view-part/?ref=snap
R11 R14 R22 R23: library part RC0805FR-07180KL, "180 kOhms Â±1% 0.125W, 1/8W Chip Resistor 0805 (2012 Metric) Moisture Resistant Thick Film", Package="2012 Yageo", Check_prices=https://www.snapeda.com/parts/RC0805FR-07180KL/Yageo/view-part/?ref=eda, MF=Yageo, MP=RC0805FR-07180KL, SnapEDA_Link=https://www.snapeda.com/parts/RC0805FR-07180KL/Yageo/view-part/?ref=snap
R13 R15 R17 R20 R21: library part RMCF0402JT47R0, "47 Ohms Â±5% 0.063W, 1/16W Chip Resistor 0402 (1005 Metric) Automotive AEC-Q200 Thick Film", Package="1005 Stackpole", Check_prices=https://www.snapeda.com/parts/RMCF0402JT47R0/Stackpole+Electronics/view-part/?ref=eda, MF="Stackpole Electronics Inc", MP=RMCF0402JT47R0, SnapEDA_Link=https://www.snapeda.com/parts/RMCF0402JT47R0/Stackpole+Electronics/view-part/?ref=snap
R25 R28 R29: library part RC0805FR-071ML, "1 MOhms Â±1% 0.125W, 1/8W Chip Resistor 0805 (2012 Metric) Moisture Resistant Thick Film", Package="2012 Yageo", Check_prices=https://www.snapeda.com/parts/RC0805FR-071ML/Yageo/view-part/?ref=eda, MF=Yageo, MP=RC0805FR-071ML, SnapEDA_Link=https://www.snapeda.com/parts/RC0805FR-071ML/Yageo/view-part/?ref=snap
R26 R27 R30 R31: library part RC0805FR-071KL, "1 kOhms Â±1% 0.125W, 1/8W Chip Resistor 0805 (2012 Metric) Moisture Resistant Thick Film", Package="2012 Yageo", Check_prices=https://www.snapeda.com/parts/RC0805FR-071KL/Yageo/view-part/?ref=eda, DigiKey_Part_Number=311-1.00KCRTR-ND, MF=Yageo, MP=RC0805FR-071KL, Purchase-URL=https://pricing.snapeda.com/search?q=RC0805FR-071KL&ref=eda, SnapEDA_Link=https://www.snapeda.com/parts/RC0805FR-071KL/Yageo/view-part/?ref=snap
SW1: library part 1101M2S3CQE2, "Switch,Slide,Sealed,SPDT,ON-NONE-ON,PC Mnt,.200 Blk Act,6A,120VAC,PC Thru-Hole", Package=None, Check_prices=https://www.snapeda.com/parts/1101M2S3CQE2/C%2526K/view-part/?ref=eda, MF=C&K, MP=1101M2S3CQE2, SnapEDA_Link=https://www.snapeda.com/parts/1101M2S3CQE2/C%2526K/view-part/?ref=snap
SW2 SW3: library part B3U-1000P, "Switch Tactile N.O. SPST Round Button Gull Wing 0.05A 12VDC 1.5N SMD Embossed T/R", Package=None, Availability=Unavailable, MP=B3U-1000P, Price=None
U1: library part TPS63070RNMR, "Wide input voltage (2V-16V) buck-boost converter", Package="VQFN-HR-15 Texas Instruments", Check_prices=https://www.snapeda.com/parts/TPS63070RNMR/Texas+Instruments/view-part/?ref=eda, MF="Texas Instruments", MP=TPS63070RNMR, SnapEDA_Link=https://www.snapeda.com/parts/TPS63070RNMR/Texas+Instruments/view-part/?ref=snap
U2: library part TLV75733PDRVR, "1-A, low-IQ high-accuracy low-dropout (LDO) voltage regulator with enable", Package="WSON-6 Texas Instruments", Check_prices=https://www.snapeda.com/parts/TLV75733PDRVR/Texas+Instruments/view-part/?ref=eda, MF="Texas Instruments", MP=TLV75733PDRVR, SnapEDA_Link=https://www.snapeda.com/parts/TLV75733PDRVR/Texas+Instruments/view-part/?ref=snap
U3: library part TPS7A2033PDBVR, "300-mA ultra-low-noise low-IQ low-dropout (LDO) linear regulator with high PSRR", Package="SOT-23 Texas Instruments", Check_prices=https://www.snapeda.com/parts/TPS7A2033PDBVR/Texas+Instruments/view-part/?ref=eda, MF="Texas Instruments", MP=TPS7A2033PDBVR, SnapEDA_Link=https://www.snapeda.com/parts/TPS7A2033PDBVR/Texas+Instruments/view-part/?ref=snap
U4: library part ESP32-H2-MINI-1-H2, "802.15.4, Bluetooth Bluetooth v5.3, ZigbeeÂ® Transceiver Module 2.4GHz Integrated, Trace Surface Mount", Package="SMD-53 Espressif Systems", Check_prices=https://www.snapeda.com/parts/ESP32-H2-MINI-1-H2/Espressif+Systems/view-part/?ref=eda, MF="Espressif Systems", MP=ESP32-H2-MINI-1-H2, SnapEDA_Link=https://www.snapeda.com/parts/ESP32-H2-MINI-1-H2/Espressif+Systems/view-part/?ref=snap
U5: "50 Î¼A, 2 mm Ã— 1.7 mm WLCSP, Low Noise, Heart Rate Monitor for Wearable Products", Package="WLCSP -20 Analog Devices", Check_prices=https://www.snapeda.com/parts/AD8233ACBZ-R7/Analog+Devices/view-part/?ref=eda, MF="Analog Devices", MP=AD8233ACBZ-R7, SnapEDA_Link=https://www.snapeda.com/parts/AD8233ACBZ-R7/Analog+Devices/view-part/?ref=snap
U6: library part ADS1220IPWR, "24-bit, 2-kSPS, four-channel, low-power, delta-sigma ADC with PGA, VREF, SPI and two IDACs", Package="TSSOP-16 Texas Instruments", Check_prices=https://www.snapeda.com/parts/ADS1220IPWR/Texas+Instruments/view-part/?ref=eda, MF="Texas Instruments", MP=ADS1220IPWR, SnapEDA_Link=https://www.snapeda.com/parts/ADS1220IPWR/Texas+Instruments/view-part/?ref=snap

## Via types
v1: diameter 17.72, hole 7.87, Top Layer to Bottom Layer, 65 vias
v2: diameter 7.87, hole 3.94, Top Layer to Bottom Layer, 31 vias
v3: diameter 28, hole 12, Top Layer to Bottom Layer, 20 vias
v4: diameter 15, hole 10, Top Layer to Bottom Layer, 19 vias
v5: diameter 15.75, hole 7.87, Top Layer to Bottom Layer, 10 vias
v6: diameter 11.81, hole 5.91, Top Layer to Bottom Layer, 4 vias
v7: diameter 17.72, hole 11.81, Top Layer to Bottom Layer, 3 vias
v8: diameter 25, hole 15, Top Layer to Bottom Layer, 2 vias
v9: diameter 13.78, hole 5.91, Top Layer to Bottom Layer, 2 vias

## Nets (pads, with @x,y where several pads share a name; then routed paths per layer and width w, separated by ;. In a path a pad name is that pad's centre, name@x,y a point inside that pad or via, vN(x,y) a via of type N, cw(c..) or ccw(c..) an arc to the next point about the centre after c; other vN are vias at no path point)
3V3A: C7.1 C12.1 C17.2 R6.2 R7.2 R16.2 U3.5 U5.A2 U5.B3 U5.C2 U6.12 | length 622.8
  Top Layer w8: C12.1 1121.09,1114.09 1158.56,1114.09 v2(1160.2,1112.45)
  Top Layer w10: C17.2 373,1571.2 390.83,1589.04 396.94,1589.04 397.69,1589.8 U6.12 ; v1(1464.33,1023.78) 1497.92,1023.78 1511.03,1036.89 R6.2 1511.03,1038.67 1497.92,1051.78 v1(1465.33,1051.78) ; R7.2 1510.85,957.78 v1(1548.33,957.78)
  Layer 2 w5: v2(1203.76,1105.5) 1203.76,1085.04 1194,1075.29 1182.01,1075.29 1171.38,1085.92 1171.38,1101.27 v2(1160.2,1112.45) 1160.2,1158.2 1166,1164 1194,1164 1203.54,1154.46 v2(1203.54,1137) ; v2@1204.09,1137.55 v2(1203.54,1137) ; v2(1219,1121.27) 1203.54,1136.73 v2(1203.54,1137)
  other v1: 1527,750 1527,783 1565,820 1592,821 1441,1310 1465,1310
  other v4: 1099,1061.5 1120,1061.5 1140.88,1061.62 364.58,1504.8 387,1505
3V3D: C5.2 C9.2 C10.1 C18.2 R3.1 R10.2 R12.2 R32.1 U2.1 U4.3 U6.13 | length 639.3
  Top Layer w10: v1(85.37,755.78) 86.84,754.3 118.7,754.3 C10.1 ; v1(85.74,730.49) 106.87,730.49 107.68,731.3 114.3,731.3 C10.1 ; U4.3 129.41,746.41 C10.1 ; C9.2@177.54,761.83 184.17,761.83 C9.2 ; C18.2 373.45,1441.1 391.28,1458.94 397.39,1458.94 502.65,1564.2 U6.13 ; R3.1 446.94,580 v1(492,580) ; R12.2 545.94,1228 v1(590,1228) ; R10.2 545,1173 v1(591,1173) ; v4(942,1396) 942,1435 R32.1
  other v1: 677,801 676.63,826.29 721.63,865.29 745.63,865.29
  other v4: 387,1380 363,1381
3V9: C3.2 C4.2 C6.1 COUT1.2 COUT2.2 COUT3.2 R1.2 R4.1 U1.7_8 U2.4 U2.6 U3.1 U3.3 | length 137.1
  Top Layer w15: U2.4 871.39,774.49 872.74,775.85 894.41,775.85 933.06,814.5 C3.2 ; U2.6 C3.2@926.06,825.44
  other v1: 1351,287 1379,288 1268,289 1297,289 1427,289 1455,289 1590,406 1591,434 1703,564 1703,587 995,786 995,815 995,842
ADC_CS: R17.1 R32.2 U6.2 | length 1225.8
  Top Layer w10: v1(396,682) R17.1 ; v4(670,1199) 879,1408 879,1513.02 ; U6.2 879,1513.02 ; R32.2@945,1498 901.94,1498 886.91,1513.02 879,1513.02
  Bottom Layer w10: v1(396,682) 670,956 v4(670,1199)
ADC_DRDY: R13.2 U6.14 | length 631
  Top Layer w10: v1(420,1414) 420,1457 501.86,1538.86 523.36,1538.86 523.6,1538.61 U6.14 ; R13.2 509.5,1115.5 543.5,1115.5 v4(544,1116)
  Bottom Layer w10: v1(420,1414) 420.86,1414.86 448.98,1414.86 544,1319.84 v4(544,1116)
BAT+: J1.1 SW1.1 | length 278
  Top Layer w15: J1.1 394.29,329.37 SW1.1
GND: C1.1 C2.1 C3.1 C4.1 C5.1 C6.2 C7.2 C9.1 C10.2 C11.2 C12.2 C14.2 C17.1 C18.1 CIN1.1 CIN2.1 COUT1.1 COUT2.1 COUT3.1 J1.2 J3.3 R2.1 R18.1 R24.1 SW2.1 SW3.2 U1.4 U1.6 U1.10 U1.15 U2.3 U2.7 U2.8 U2.9 U3.2 U4.1 U4.2 U4.11 U4.14 U4.36 U4.37 U4.38 U4.39 U4.40 U4.41 U4.42 U4.43 U4.44 U4.45 U4.46 U4.47 U4.48 U4.49_1 U4.49_2 U4.49_3 U4.49_4 U4.49_5 U4.49_6 U4.49_7 U4.49_8 U4.49_9 U4.50 U4.51 U4.52 U4.53 U4.54 U4.56 U5.A1 U5.B2 U6.3 U6.4 U6.5 | length 749.6
  Top Layer w8: v1(970,192) 971.86,193.86 978.75,193.86 996.39,211.5 996.39,216.02 997.31,216.94 U1.15
  Top Layer w10: v1(111.74,638.49) 128,654.75 C10.2 ; v1(146,633) 147.48,634.48 155.27,634.48 195.9,675.1 C9.1 ; v1(148.84,559.31) 187.76,559.31 SW2.1 ; v4(380,853) 380.69,852.31 380.69,818.53 U4.11 ; SW3.2 619.93,1298.28 630.68,1287.54 669.46,1287.54 v1(670,1287) ; v4(746,1553) 747.35,1553 758.27,1563.92 796.71,1563.92 U6.4 ; v4(746,1603) 747.35,1603 759.27,1591.08 795.71,1591.08 U6.5 ; v2(794.4,1170) 794.63,1169.77 815.09,1169.77 827.02,1157.84 R18.1 ; U6.3 797.3,1538.31 849.69,1538.31 v4(850,1538) ; 1127,238 1150,238 v5(1151,237) ; C14.2 1373.33,1259.78 v1(1373.33,1307.54) ; R24.1 1411,1041.4 v2(1411,1006)
  Top Layer w15: v8(250,1563.1) 302.1,1563.1 C17.1 ; v8(251,1435) C18.1
  other v1: 203,215 230,215 263,215 290,215 204,242 204,267 894,409 921,409 1188,410 1213,410 825,455 733,456 763,456 855,456 1445,459 1338,460 1366,460 1419,460 1251,461 1279,461 731,697 756,697 707,698
  other v2: 1204,1121 1188.01,1137
  other v3: 321.42,157.64 321.42,472.6 636.38,472.6 793.86,472.6 236,633 393.48,633 708.44,633 865.92,633 1023.4,633 1180.88,633 1495.84,633 557.64,945.04 1653.32,947.96 1660,1260 1266.3,1417.48 1345.04,1574.96 708.44,1577.88 865.92,1577.88 1023.4,1577.88 1653.32,1577.88
  other v4: 1062,1062 1036.18,1062.79
  other v5: 1151,110
  other v7: 994,62 1026,62 994,90
  other v9: 1036,228 1082,228
IA/OP: C16.1 R9.2 R25.1 | length 692.4
  Top Layer w7: R25.1 R25.1@811.06,1014.54 ; C16.1 938.05,1122.89 919.41,1122.89 R25.1@811.06,1014.54 ; R9.2@1023.25,1297.08 1014.2,1297.08 973.12,1256 844.7,1256 775.9,1187.2 775.9,1136.1 811.06,1100.94 R25.1@811.06,1014.54
LA: J2.2 R7.1 R11.1 | length 917.4
  Top Layer w10: J2.2 1413.54,1513.32 1561,1365.85 1561,1100.49 1584.49,1077 1618.14,1077 1624,1071.14 1624,972 1618.14,966.14 1593.97,966.14 R7.1 1585.83,948.94 1572.72,935.83 1563.66,935.83 1517.23,889.4 R11.1
LOD_MCU: R31.2 U4.21 | length 626.5
  Top Layer w10: U4.21 458.82,1144.61 461.51,1141.92 644.92,1141.92 843,1340 889.14,1340 932.94,1296.2 R31.2
NetC2_2: C2.2 U1.3 | length 105.3
  Top Layer w10: C2.2 1069.16,102.16 U1.3
NetC8_1: C8.1 U5.A5 | length 92.9
  Top Layer w5: U5.A5@1251.5,1136.5 1291,1176 C8.1@1291,1213
NetC8_2: C8.2 R8.1 U5.A4 | length 229.9
  Top Layer w5: 1214.84,1172.19 1235.25,1151.78 U5.A4
  Top Layer w7: R8.1 1110.06,1222 1135.77,1196.29 1163.26,1196.29 1167.48,1192.06 1194.97,1192.06 ; C8.2 1194.97,1223.8 1194.97,1192.06 ; 1214.84,1172.19 1194.97,1192.06
NetC11_1: C11.1 R3.2 SW2.2 U4.8 | length 461.5
  Top Layer w10: C11.1 291.1,743.45 327.19,707.36 327.19,706.17 332,701.36 SW2.2@332,583 ; C11.1@286.89,745.34 U4.8 ; SW2.2@330.37,566.7 323.93,560.25 SW2.2 332,565.07 332,689.36 ; SW2.2@330.37,578.7 334.68,583 R3.2
NetC13_1: C13.1 R19.1 R23.2 U5.D5 | length 533.1
  Top Layer w5: v2(1251,1089.76) 1294.35,1046.4
  Top Layer w8: C13.1 1269,976 v2(1269,1022) 1293.4,1046.4 1294.35,1046.4 R19.1 1328,1047.4 v2(1328,1079) ; v2(1604,1096) 1604,1133.83 R23.2
  Bottom Layer w8: v2(1328,1079) 1587,1079 v2(1604,1096)
NetC13_2: C13.2 R19.2 U5.C4 | length 256
  Top Layer w8: C13.2 1199.1,981.1 1232,1014 v2(1232,1022) ; v2(1281,1133) 1291,1123 1327.6,1123 R19.2
  Bottom Layer w5: v2(1232,1022) 1232,1062.47 1236,1066.47 1236,1092.06 1235,1093.06 v2(1235,1106) ; v2@1236,1105 1253,1105 v2(1281,1133)
NetC14_1: C14.1 R16.1 R24.2 U5.A3 | length 382.9
  Top Layer w8: v2(1329,1186) 1368.45,1186 C14.1 1373,1145.54 1397.94,1120.6 R24.2 1415.72,1120.6 1429.83,1134.71 1429.83,1174.29 1443.94,1188.4 R16.1 R16.1@1450.85,1190.55
  Bottom Layer w5: v2(1219.5,1137) 1219.5,1167.07 1238.43,1186 v2(1329,1186)
NetC15_1: C15.1 R26.2 R28.2 U5.C3 | length 1659.4
  Top Layer w5: R28.2 1047,934.63 v2(1047,965)
  Top Layer w10: v2(235,1751) 236,1752 R26.2 ; C15.1 965.64,933.88 R28.2
  Bottom Layer w5: v2(235,1751) 235,1700 225,1690 225,1619 394,1450 542.59,1450 949.09,1043.5 v2@1002,1043.5 ; v2(1047,965) 1002,1010 v2@1002,1043.5 ; v2(1219.5,1105.5) 1218.95,1104.95 1218.95,1102.92 1218.22,1102.19 1218.22,1098.76 1194.22,1074.76 1171.93,1074.76 1158.38,1061.2 1158.38,1054.38 1148,1044 v2(1002,1044) v2@1002,1043.5
NetC15_2: C15.2 R25.2 U5.D3 | length 410.3
  Top Layer w5: C15.2 979.34,983.39 1153.27,983.39 1163.22,993.33 1163.22,1001.49 1173.16,1011.44 1173.66,1011.44 1204.4,1042.17 ; 1204.4,1042.19 1219.5,1057.29 U5.D3
  Top Layer w10: R25.2 957.25,1005.48 C15.2
NetC16_2: C16.2 R29.1 R30.1 U5.D1 | length 1951.7
  Top Layer w5: v2(240,1646) 240.78,1646 241.78,1647 R30.1 ; v2(1174.4,1054.6) 1188.01,1068.22 v2(1188.01,1089.76)
  Top Layer w7: C16.2@985.3,1059.67 963.09,1081.87 C16.2 905.35,1081.87 851,1027.52 851,982.25 929.19,904.07 1084.21,904.07 1113.94,933.8 R29.1 1121.61,933.8 1107,948.41 v2(1107,964)
  Bottom Layer w5: v2(240,1646) 363.5,1522.5 626.25,1522.5 1058.99,1089.76 v2(1188.01,1089.76)
  Bottom Layer w7: v2(1107,964) 1125,964 1174.4,1013.4 v2(1174.4,1054.6)
NetL1_1: L1.1 U1.9
  other v5: 1135,466 1135,487 1135,510 1135,532
  other v6: 1083,260 1083,288
NetL1_2: L1.2 U1.11
  other v5: 975,462 975,487 975,512 975,534
  other v6: 1036,258 1036,289
NetR1_1: R1.1 R2.2 U1.5 | length 188.2
  Top Layer w10: U1.5 1155.53,216.94 1192.72,179.76 R1.1 1192.72,174.24 1241.67,125.29 1242.19,125.29 1254.12,113.36 R2.2
NetR4_2: R4.2 U1.2 | length 175.6
  Top Layer w8: R4.2@921,106 969.18,106 1048.79,185.61 1048.79,199.53 U1.2
NetR5_2: R5.2 U1.1 U1.14 | length 234.4
  Top Layer w10: U1.14 986.66,236.63 937.11,187.08 936.08,187.08 R5.2 1001.57,172 1022.98,193.4 1029.71,193.4 1029.79,193.48 U1.1
NetR8_2: R8.2 R9.1 U5.B4 | length 390.4
  Top Layer w7: R9.1 1036.83,1221.88 1096.89,1281.93 1209.99,1281.93 1250,1241.93 v2(1250,1169)
  Bottom Layer w5: v2(1235.25,1121.25) 1250,1136 v2(1250,1169)
NetR10_1: R10.1 U4.22 | length 71
  Top Layer w10: U4.22 482.02,1176.11 R10.1
NetR11_2: R11.2 U5.B5 | length 268.2
  Top Layer w5: U5.B5 1251.75,1120.5 1270.16,1120.5 1284.17,1106.5 1284.71,1106.5 1295.23,1095.99 1335.3,1095.99 1372.33,1058.95 1372.33,1024.18 1393.5,1003.02 1393.5,998.75 1399.33,992.92 1399.33,980.21 1414.94,964.6 R11.2
NetR12_1: R12.1 SW3.1 U4.23 | length 164.5
  Top Layer w10: U4.23 463.27,1207.6 485.67,1230 R12.1 SW3.1
NetR13_1: R13.1 U4.20 | length 60.7
  Top Layer w10: U4.20 U4.20@418.75,1115.06 ; U4.20@418.75,1113.06 473.99,1113.06 R13.1
NetR14_2: R14.2 U5.C5 | length 195
  Top Layer w5: U5.C5 1263.95,1105.5 1278.45,1091 v2(1279,1091) ; v2(1345,994) 1345,993.22 1346,992.22 R14.2
  Bottom Layer w5: v2(1279,1091) 1278.45,1090.45 1278.45,1081.67 1270.78,1074.01 1270.78,1068.22 v2(1345,994)
NetR15_2: R15.2 U4.9 | length 75.6
  Top Layer w10: U4.9 318.39,785.42 348.8,755 R15.2
NetR17_2: R17.2 U4.10 | length 81.5
  Top Layer w10: U4.10 349.88,809.96 389.19,770.66 389.19,762.15 395.8,755.54 R17.2
NetR18_2: R18.2 R27.1 U5.B1 | length 429.2
  Top Layer w5: 999.6,1172 1149,1172 1174.59,1146.41 1174.59,1132.86 1182.86,1124.58 1183.37,1124.58 1186.7,1121.25 U5.B1
  Top Layer w7: R27.1 872.64,1221 887.25,1206.39 R18.2 919.11,1155.48 923.21,1159.58 923.21,1174.31 928.19,1179.29 992.32,1179.29 999.6,1172 ; U5.B1@1187.46,1121.8 U5.B1
NetR20_2: R20.2 U4.18 | length 65.9
  Top Layer w10: U4.18 424.68,1050.12 430.81,1044 464.66,1044 475.46,1033.2 R20.2
NetR21_2: R21.2 U4.19 | length 61.8
  Top Layer w10: U4.19 424.68,1081.62 432.3,1074 R21.2
NetR22_2: R22.2 R23.1 | length 60.2
  Top Layer w8: R23.1 R22.2
NetR28_1: R28.1 R29.2 U5.D2 | length 206.8
  Top Layer w5: R28.1 R28.1@1046.33,1009 ; R29.2 1136.3,1022.3 1162.81,1022.3 1166.95,1026.44 1167.44,1026.44 1180.6,1039.6 1189.4,1048.39 1203.76,1062.76 U5.D2
  Top Layer w10: R28.1@1046.33,1009 R29.2
NetR31_1: R31.1 U5.C1 | length 299.1
  Top Layer w7: R31.1 947,1216 v2(985,1216)
  Bottom Layer w5: 1087,1216 1188,1115 v2(1188,1105.78)
  Bottom Layer w7: v2(985,1216) 1087,1216
OUT: C19.2 R30.2 U6.11 | length 233.5
  Top Layer w10: R30.2 354.95,1649.35 C19.2 449.1,1649.35 483.07,1615.39 U6.11
RA: J2.3 R6.1 R14.1 | length 1080.8
  Top Layer w10: J2.3 1197,1541.12 1219.81,1518.32 1288.52,1518.32 1371.84,1435 1460,1435 1541,1354 1541,1092.2 1553.12,1080.08 1553.12,1079.17 1586.23,1046.06 R6.1 1586.23,1027.94 1573.12,1014.83 1548.28,1014.83 1533.28,999.83 1493.05,999.83 1464.69,971.48 1464.69,945.87 1443.01,924.19 1389.84,924.19 1355.06,889.4 R14.1
REFOUT: C19.1 R26.1 U6.10 | length 265.4
  Top Layer w10: R26.1 403.54,1752 436.9,1718.65 449.1,1718.65 466.94,1700.81 526.77,1640.98 U6.10
RL: J2.1 R22.1 | length 343.3
  Top Layer w15: J2.1 1553.02,1621.74 1604.25,1570.51 R22.1
RX: J3.1 U4.31 | length 171.7
  Top Layer w10: J3.1 124.42,1325.58 157.1,1325.58 192.4,1290.28 U4.31
SDN_MCU: R27.2 U4.16 | length 578.2
  Top Layer w10: U4.16 548.88,987.13 857.94,1296.2 R27.2
SPI_MISO: R15.1 U6.15 | length 1000.3
  Top Layer w10: v1(348.86,683) 348.93,683.07 348.93,721.86 R15.1 ; v1(438,1398) 438,1447 504,1513 U6.15
  Bottom Layer w10: v1(348.86,683) 438,772.14 v1(438,1398)
SPI_MOSI: R21.1 U6.16 | length 567.6
  Top Layer w10: v1(457,1383) 457,1434 510,1487 570.57,1487 U6.16 ; R21.1 v4(544,1074)
  Bottom Layer w10: v1(457,1383) 457,1161 v4(544,1074)
SPI_SCLK: R20.1 U6.1 | length 596.1
  Top Layer w10: R20.1 509.04,1032.5 543.5,1032.5 v4(544,1032) ; v4(655,1216) 796.99,1357.99 U6.1
  Bottom Layer w10: v4(544,1032) 654.5,1142.5 654.5,1215.5 v4(655,1216)
TX: J3.2 U4.30 | length 265.6
  Top Layer w10: J3.2 223.9,1326.1 U4.30
VIN: C1.2 CIN1.2 CIN2.2 R5.1 SW1.2 U1.12_13
pads on no net: J1.T1 J1.T2 SW1.3 U2.2 U2.5 U3.4 U4.4 U4.5 U4.6 U4.7 U4.12 U4.13 U4.15 U4.17 U4.24 U4.25 U4.26 U4.27 U4.28 U4.29 U4.32 U4.33 U4.34 U4.35 U4.55 U4.57 U4.58 U4.59 U4.60 U4.61 U4.62 U4.63 U4.64 U4.65 U5.D4 U6.6 U6.7 U6.8 U6.9

## Polygon pours and split planes (outlines as drawn)
GND on Top Layer "VEE_-5V0_L03_P-001" (solid, remove dead copper, pour order 58): 17,1804 1710,1804 1719,1795 1719,13 28,13 11,30 17,36 17,1793
GND on Top Layer "VEE_-5V0_L03_P-001" (solid, remove dead copper, pour order 53): 47,480 246,480 246,624 453,624 489,660 787,660 888,761 888,836 756,968 756,1236 816,1296 816,1358 888,1358 917,1387 968,1387 971,1390 968,1393 968,1537 876,1537 841,1572 468,1572 468,1535.68 394.32,1462 391.32,1465 214,1465 214,1468 138,1544 138,1655 18,1655 6,1643 6,479
GND on Top Layer "VEE_-5V0_L03_P-001" (solid, remove dead copper, pour order 51): 763.49,1173.72 816.76,1227 818,1227 818,1324 842,1348 1079,1348 1079,1788 1638,1788 1638,907 1699,846 1699,698 1660,659 1660,649 1481,649 1232,898 1232,900 879,900 808,971 776,971 770,977
GND on Top Layer "VEE_-5V0_L03_P-001" (solid, remove dead copper, pour order 55): 956.24,1789 1623,1789 1638,1774 1436.69,1572.69 957.31,1572.69 878.36,1651.64
GND on Top Layer "VEE_-5V0_L03_P-001" (solid, remove dead copper, pour order 54): 153,1785 150,1782 150,1547 151,1547 215,1483 400,1483 400,1489 489,1578 1112,1578 1321.96,1787.96
GND on Top Layer "VEE_-5V0_L03_P-001" (solid, pour order 17): 1625,457 1687,457 1689,459 1689,538 1642,538 1636,544 1636,710 1711,710 1713,712 1713,817 1623,817 1617,811 1617,658 1608,649 1607,650 1562,650 1562,619 1570,611 1603,611 1603,548.23 1617,534.23 1617,457 1616,456 1626,456
3V9 on Top Layer "VEE_-5V0_L03_P-001" (solid, pour order 15): 1502,363 1530,391 1530,590 1551,611 1603,611 1603,539 1705,437 1705,35 1683,13 1369,13 1365,17 1366,18 1366,155
GND on Top Layer "VEE_-5V0_L03_P-001" (solid, pour order 9): 1027,219 1091,219 1091,236 1088,239 1066,239 1066,314 1070,318 1120,318 1120,369 1139,388 1496,388 1504,396 1504,642 667,642 671,638 671,385 924,385 990,319 1049,319 1052,316 1052,238 1027,238
VIN on Top Layer "VEE_-5V0_L03_P-001" (solid, pour order 2): 433,287 506,360 978,360 978,326 1019,285 1018,284 1018,250 984,250 890,156 890,143 508,143 432,219
3V9 on Top Layer "VEE_-5V0_L03_P-001" (solid, pour order 11): 1099,249 1099,293 1146,340 1146,363 1502,363 1502,86 1503,85 1287,85 1287,149 1288,150 1285,153 1238,153 1238,174 1161,251 1159,249
GND on Top Layer "VEE_-5V0_L03_P-001" (solid, pour order 49): 845,753 848,756 949,756 949,701 944,696 801,696
3V9 on Top Layer "VEE_-5V0_L03_P-001" (solid, pour order 48): 857,849 916,849 927,838 900.94,811.94 871.06,811.94 857,826
3V3A on Top Layer "VEE_-5V0_L03_P-001" (solid, pour order 47): 348,1492 349,1491 404,1491 404,1569 392,1581 354,1581 342,1569 342,1493
GND on Top Layer "VEE_-5V0_L03_P-001" (solid, pour order 46): 1504,642 1505.84,643.84 1562,643.84 1562,621.2 1492.8,552 1437,552
3V3D on Top Layer "VEE_-5V0_L03_P-001" (solid, pour order 39): 350,1462 394.32,1462 398,1458.32 398,1373 352,1373 349,1376
3V3D on Top Layer "VEE_-5V0_L03_P-001" (solid, pour order 34): 77,775 78,776 238,776 238,713 236,711 76,711
3V3D on Top Layer "VEE_-5V0_L03_P-001" (solid, pour order 33): 652,891 773,891 773,798 755,780 650,780
3V3A on Top Layer "VEE_-5V0_L03_P-001" (solid, pour order 31): 1510,851 1512,853 1614,853 1614,659.71 1602.29,648 1540,648 1540,693 1510,723 1510,855
3V3A on Top Layer "VEE_-5V0_L03_P-001" (solid, pour order 30): 1479,1326 1479,1263 1465,1249 1442,1272 1425,1272 1425,1324 1423,1326
GND on Top Layer "VEE_-5V0_L03_P-001" (solid, pour order 29): 1076,1145 1076,1058 1068,1050 1024,1050 1024,1138 1031,1145 1024,1138 1031,1145
3V3A on Top Layer "VEE_-5V0_L03_P-001" (solid, pour order 28): 1098,1147 1145,1147 1150,1142 1150,1052 1096,1052 1088,1060 1088,1137
GND on Top Layer "VEE_-5V0_L03_P-001" (solid, pour order 26): 700,768 701,767 764,767 784,787 836,787 836,786 845,777 845,729 792,676 688,676 688,755 700,767
3V3D on Top Layer "VEE_-5V0_L03_P-001" (solid, pour order 25): 703,841 704,840 807,840 807,815 805,813 773,813 773,798 762,787 703,787
GND on Top Layer "VEE_-5V0_L03_P-001" (solid, pour order 12): 983,97 999,113 1046,113 1046,76 1095,76 1095,91 1098,94 1133,94 1133,78 1101,46 983,46 982,47 982,97
3V9 on Top Layer "VEE_-5V0_L03_P-001" (solid, pour order 22): 905,847 906,846 979,846 987,854 1011,854 1011,776 1006,771 978,771 978,775 968,785 888,785 888,838.5
3V9 on Top Layer "VEE_-5V0_L03_P-001" (solid, pour order 20): 1641.68,605.7 1714.3,605.7 1716,604 1716,546 1647,546 1643,550
GND on Top Layer "VEE_-5V0_L03_P-001" (solid, pour order 14): 191,281 376,281 377,280 377,208 191,208 190,209
3V9 on Top Layer "VEE_-5V0_L03_P-001" (solid, pour order 13): 892,73 972,73 974,71 974,39 1107,39 1139,71 1286,71 1286,84 1287,85 1395,85 1395,26 1381,12 885,12 885,72.53
GND on Top Layer "VEE_-5V0_L03_P-001" (solid, pour order 10): 1216,136 1216,78 1110,78 1096,92 1096,125 1084,125 1082,127 1083,128 1083,211 1095,211 1106,200 1106,194 1134,194 1154,174 1154,140 1159,140 1163,136
NetL1_1 on Top Layer "VEE_-5V0_L03_P-001" (solid, pour order 8): 1078,587 1144,587 1145,586 1145,439 1081,439 1078,442
NetL1_2 on Top Layer "VEE_-5V0_L03_P-001" (solid, pour order 3): 967,586 968,587 1033,587 1033,445 1030,442 967,442
BAT+ on Top Layer "VEE_-5V0_L03_P-001" (solid, pour order 1): 217,361 383,361 383,423 469,509 585,509 585,392 586,391 573,378 484,378 400,294 218,294 218,361 217,362
GND on Bottom Layer "VEE_-5V0_L03_P-001" (solid, remove dead copper, pour order 57): 0,1817 1728.75,1817 1728.75,9 0,9
NetL1_1 on Bottom Layer "VEE_-5V0_L03_P-001" (solid, pour order 7): 1069,357 1068,358 1097,387 1097,544 1096,545 1097,546 1145,546 1145,380 1087,322 1087,249 1085,247 1069,247
NetL1_2 on Bottom Layer "VEE_-5V0_L03_P-001" (solid, pour order 6): 1031,247 1047,247 1048,248 1048,357 1017,388 1017,546 969,546 964,541 964,387 1032,319 1031,318
GND on Layer 2 "VEE_-5V0_L03_P-001" (solid, remove dead copper, pour order 56): 8.07,1801 1715,1801 1715,5.5 2,5.5
3V3D on Layer 2 "VEE_-5V0_L03_P-001" (solid, pour order 41): 409,1372 219,1562 219,1673 238,1692 873,1692 928,1637 926,1635 926,1377 957,1377 975,1395 975,1672 915,1732 192,1732 159,1699 159,1551 350,1360 408,1360
3V3D on Layer 2 "VEE_-5V0_L03_P-001" (solid, pour order 45): 485,561 523,561 523,609 618,704 617,705 617,760 551,760 478,687 478,568
3V3A on Layer 2 "VEE_-5V0_L03_P-001" (solid, pour order 40): 1544,742 1544,814 1379,814 747,1446 747,1448 485,1448 417,1516 417,1521 337,1521 330,1528 330,1489 386,1489 489,1386 707,1386 1366,727 1537,727 1540,730
3V3A on Layer 2 "VEE_-5V0_L03_P-001" (solid, pour order 44): 1426,1328 1480,1328 1480,1145 1532,1093 1532,1062 1468,1062 1424,1106 1424,1327
3V3D on Layer 2 "VEE_-5V0_L03_P-001" (solid, pour order 38): 354,1397 408,1397 456,1349 552,1349 618,1283 616,1281 616,1249 575,1249 568,1242 566,1244 566,1278 530,1314 396,1314 350,1360 350,1393
3V3D on Layer 2 "VEE_-5V0_L03_P-001" (solid, pour order 36): 701,849 703,847 764,847 764,1028 616,1176 616,1249 581,1249 578,1252 568,1242 568,1144 702,1010 702,851
3V3D on Layer 2 "VEE_-5V0_L03_P-001" (solid, pour order 35): 71,769 72,770 590,770 662,842 695,842 695,789 699,785 618,704 80,704 70,714 70,769
3V3A on Layer 2 "VEE_-5V0_L03_P-001" (solid, pour order 32): 1456,1074 1532,1074 1548,1058 1548,979 1562,965 1561,964 1561,885 1571,885 1608,848 1608,806 1543,806 1471,878 1471,997 1464,997 1455,1006 1455,1073
3V9 on Layer 2 "VEE_-5V0_L03_P-001" (solid, pour order 21): 982,853 980,851 980,771 1094,771 1233,632 1233,279 1475,279 1480,274 1480,533 1228,785 1154,859 986,859
3V9 on Layer 2 "VEE_-5V0_L03_P-001" (solid, pour order 18): 1580,444 1672,536 1672,600 1714,600 1715,601 1718,598 1718,506 1593,381 1579,395 1579,444
GND on GND (split plane): 1704.9,25.6 22.07,25.6 20.13,1796.9 1704.9,1796.9

## Text inside footprints (layer, text, board x,y; h text height)
U4: Mechanical 13 "PCB Edge" at -4.45,1329.65 h35.43 r90